# Altium PCB Skipper.PcbDoc (part 1 of 3)
Units mm, origin at the board's own origin, x right, y up, seen from the top; angles counter-clockwise.
Board outline 132 x 77.5 mm, 4 copper layers (L1, L2, L3, L4), stack 1.586 mm thick; 219 components, 173 nets, 859 pads, 487 vias.
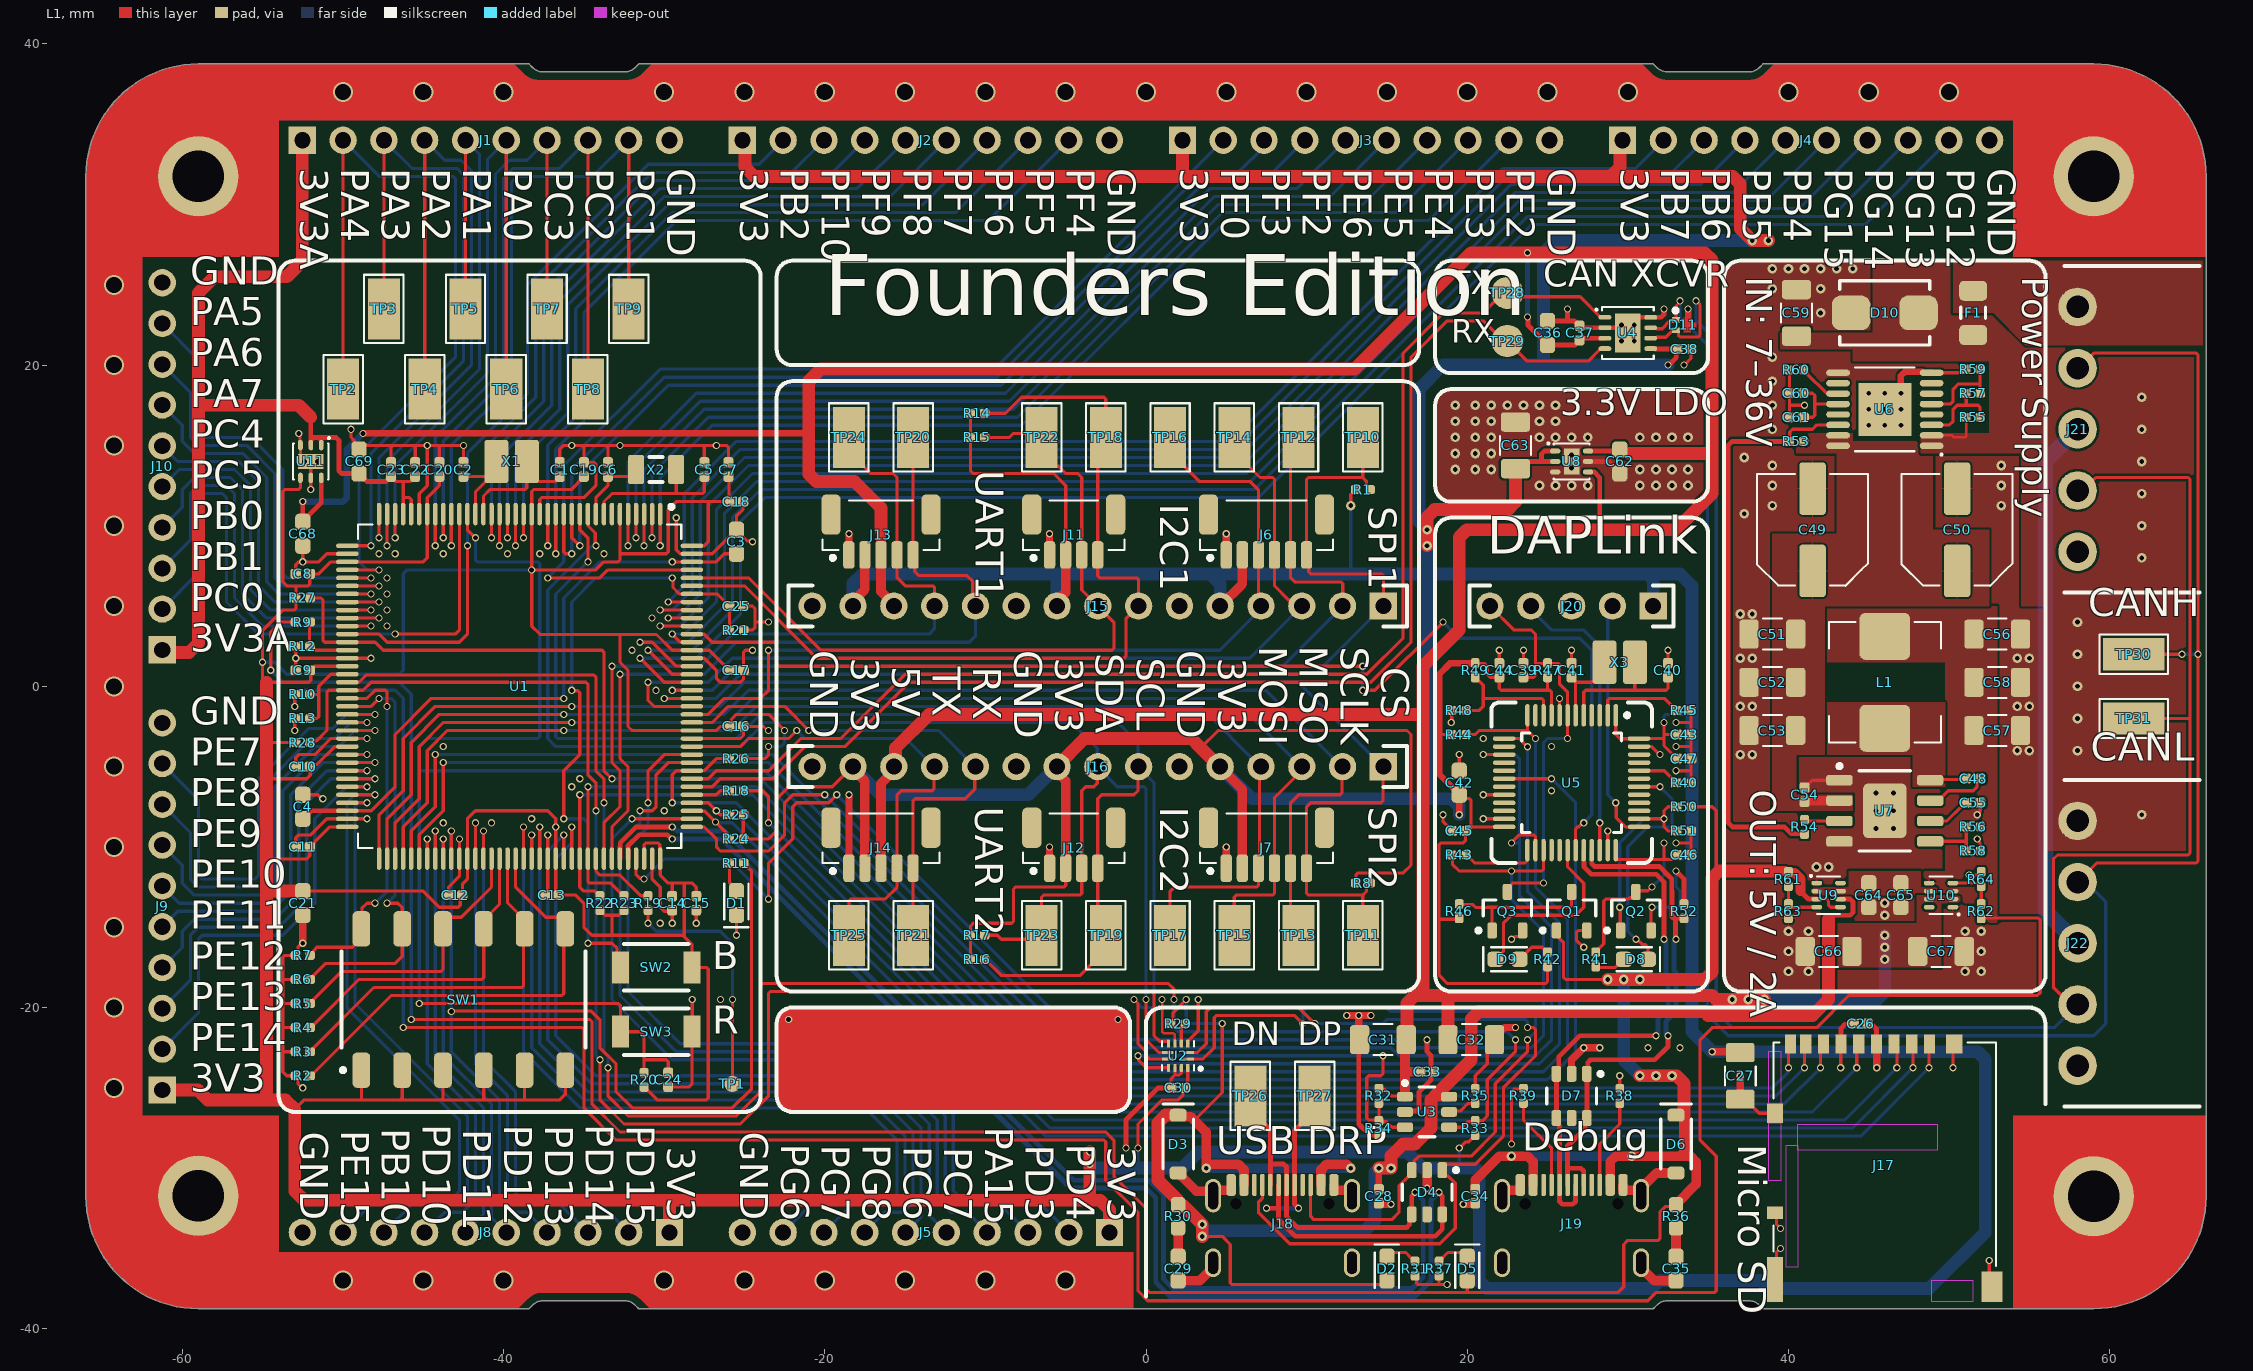
[diagram p0: L1 view]
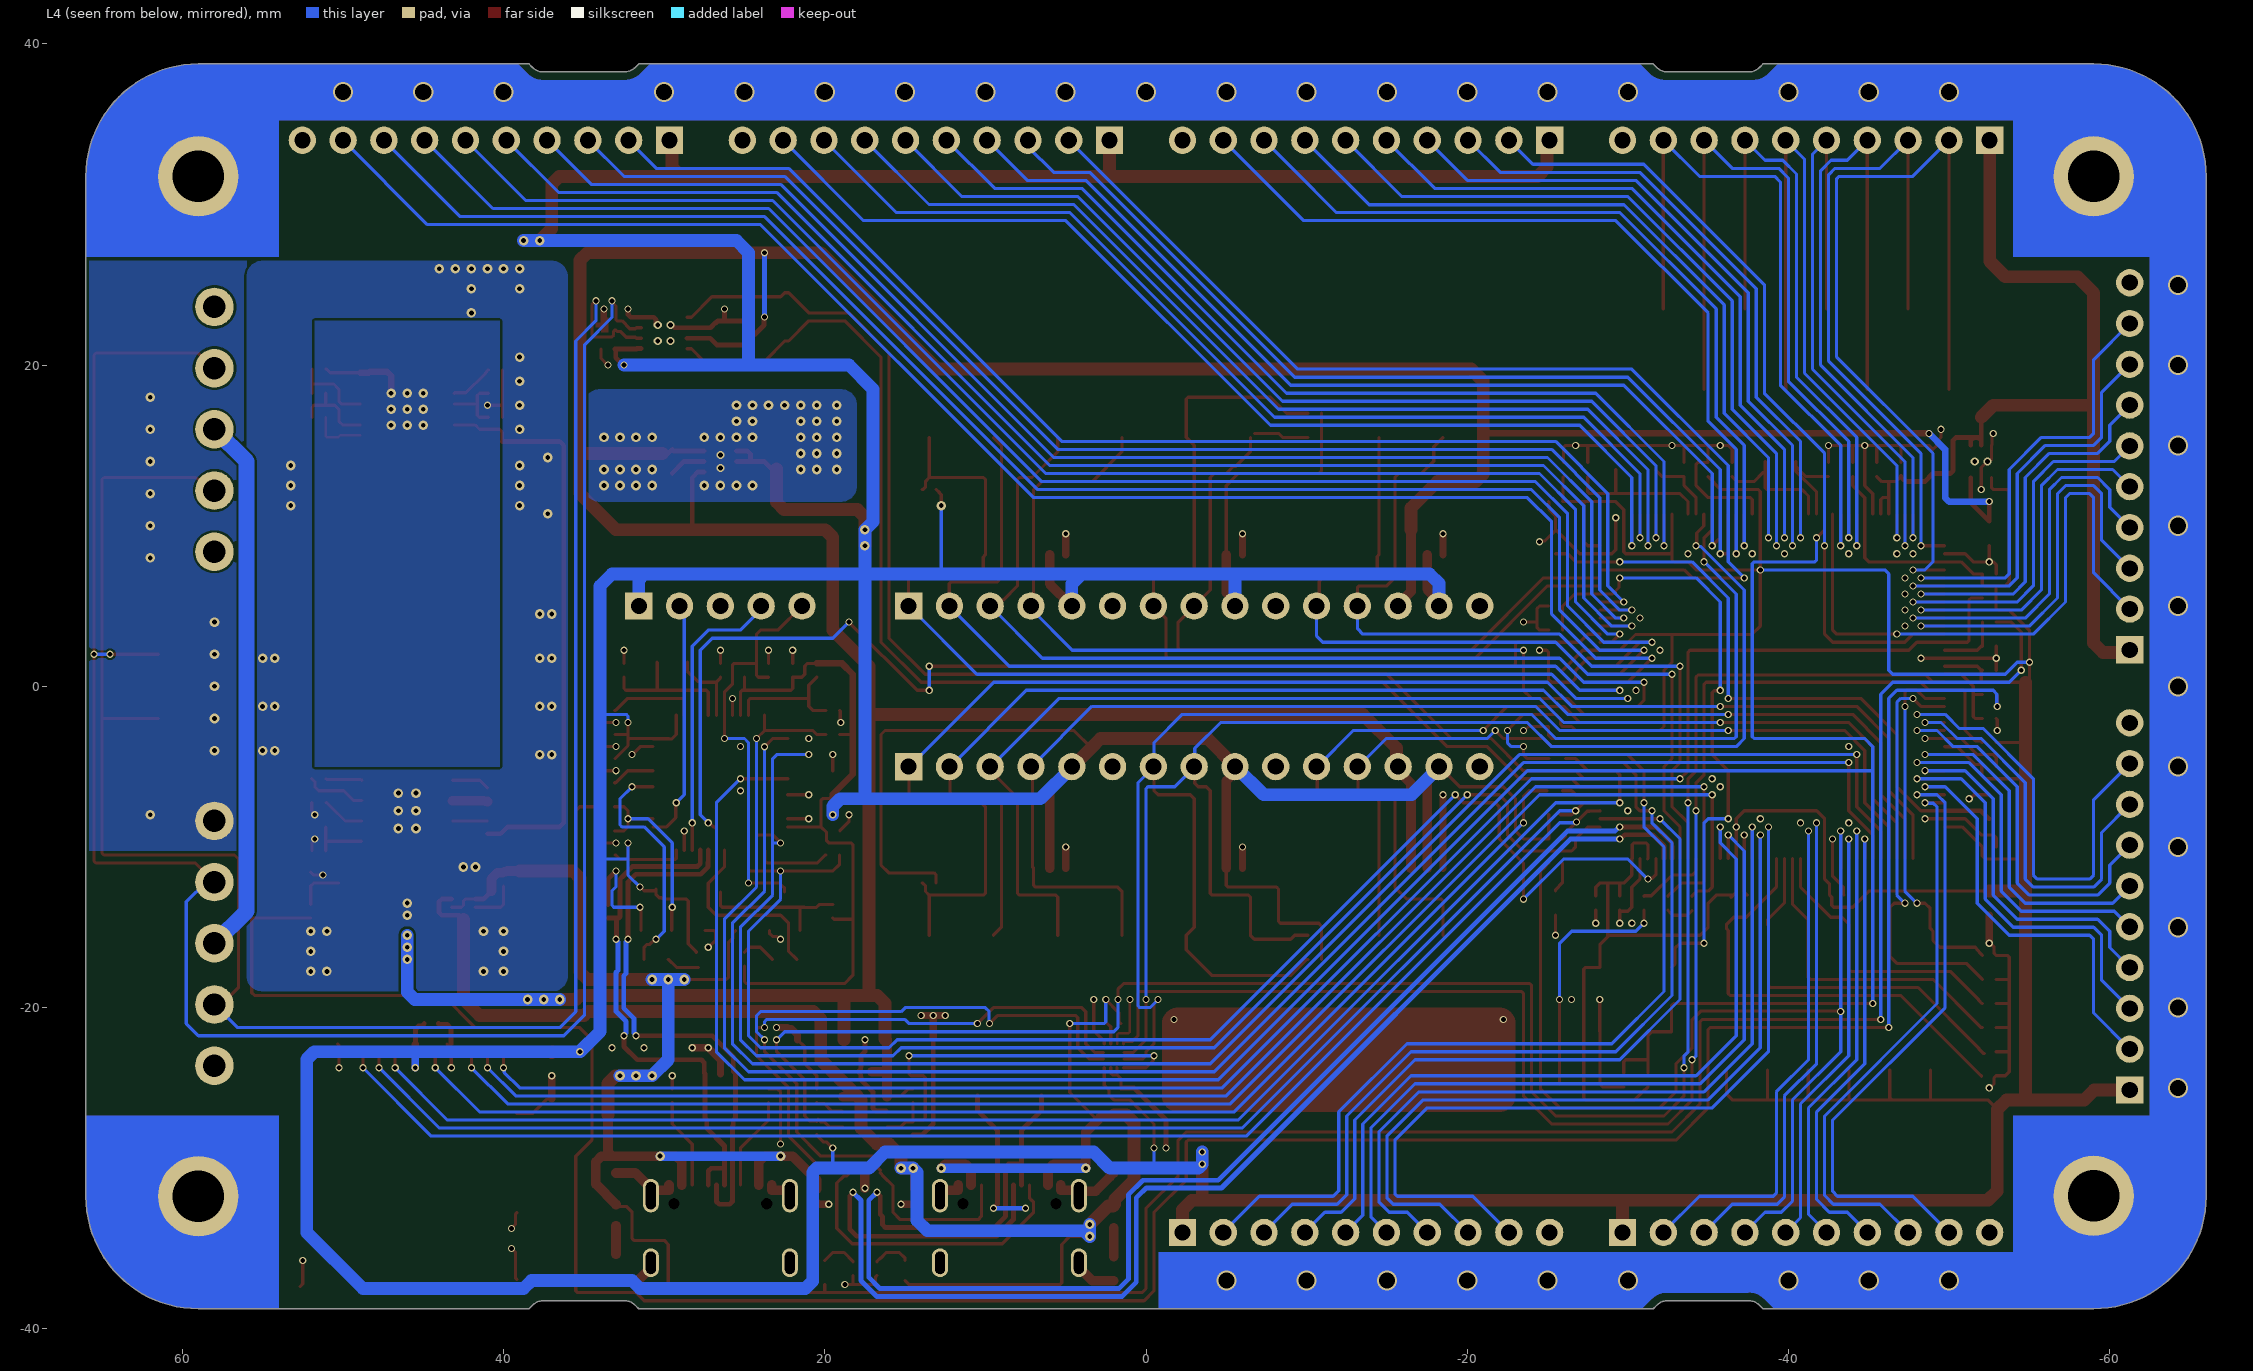
[diagram p1: L4 view, seen from below]
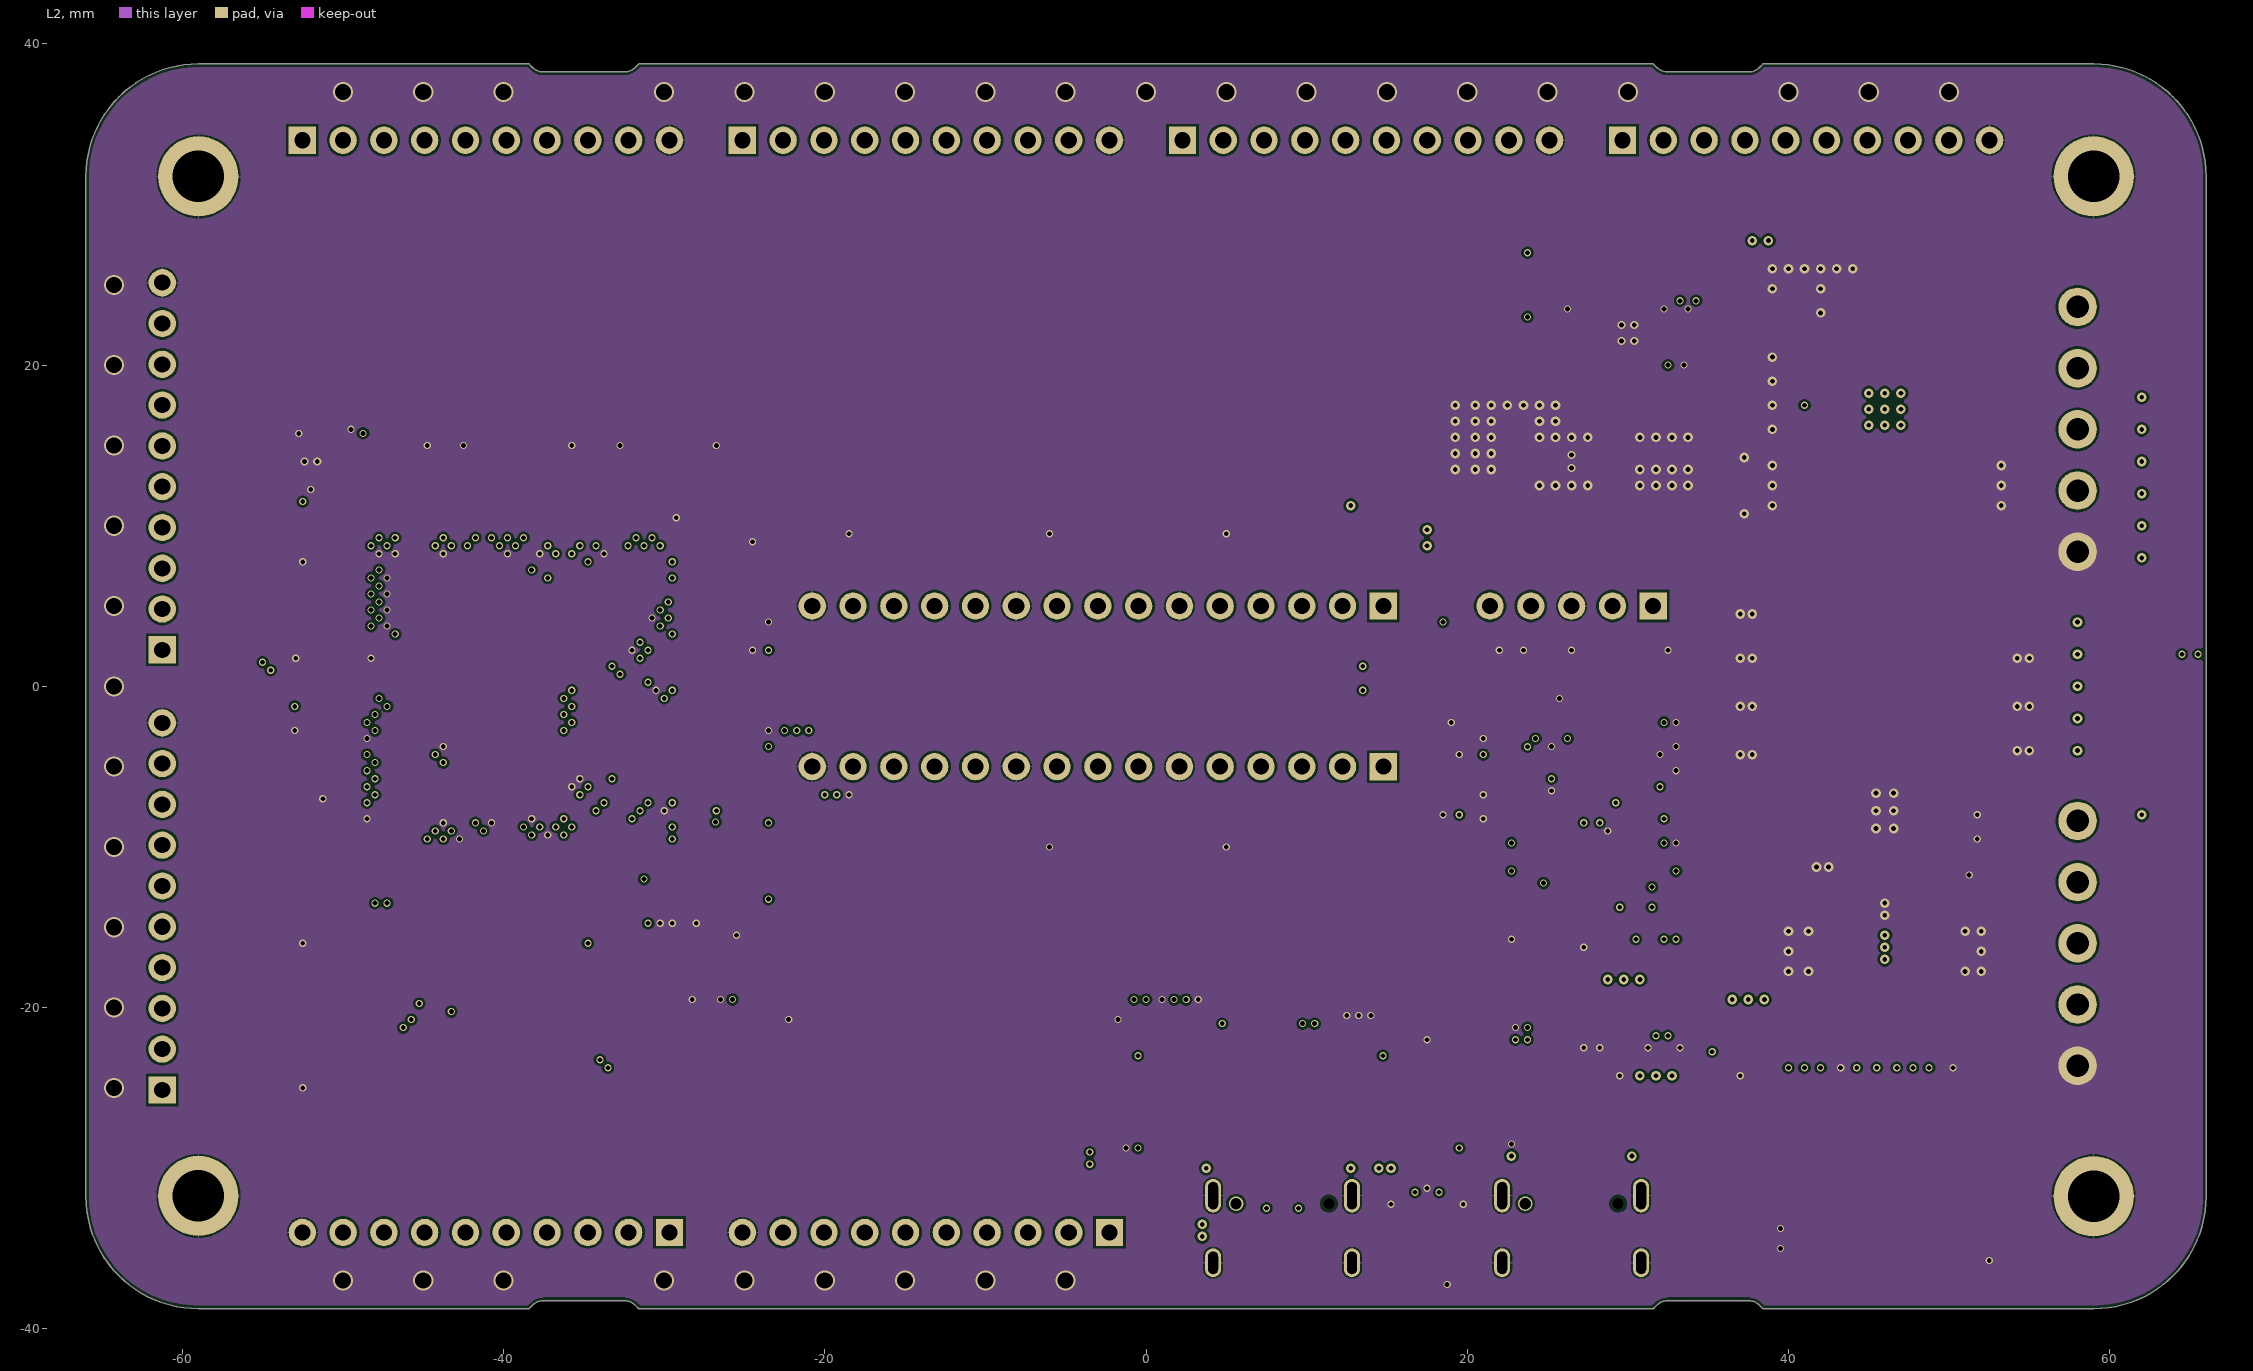
[diagram p2: L2]
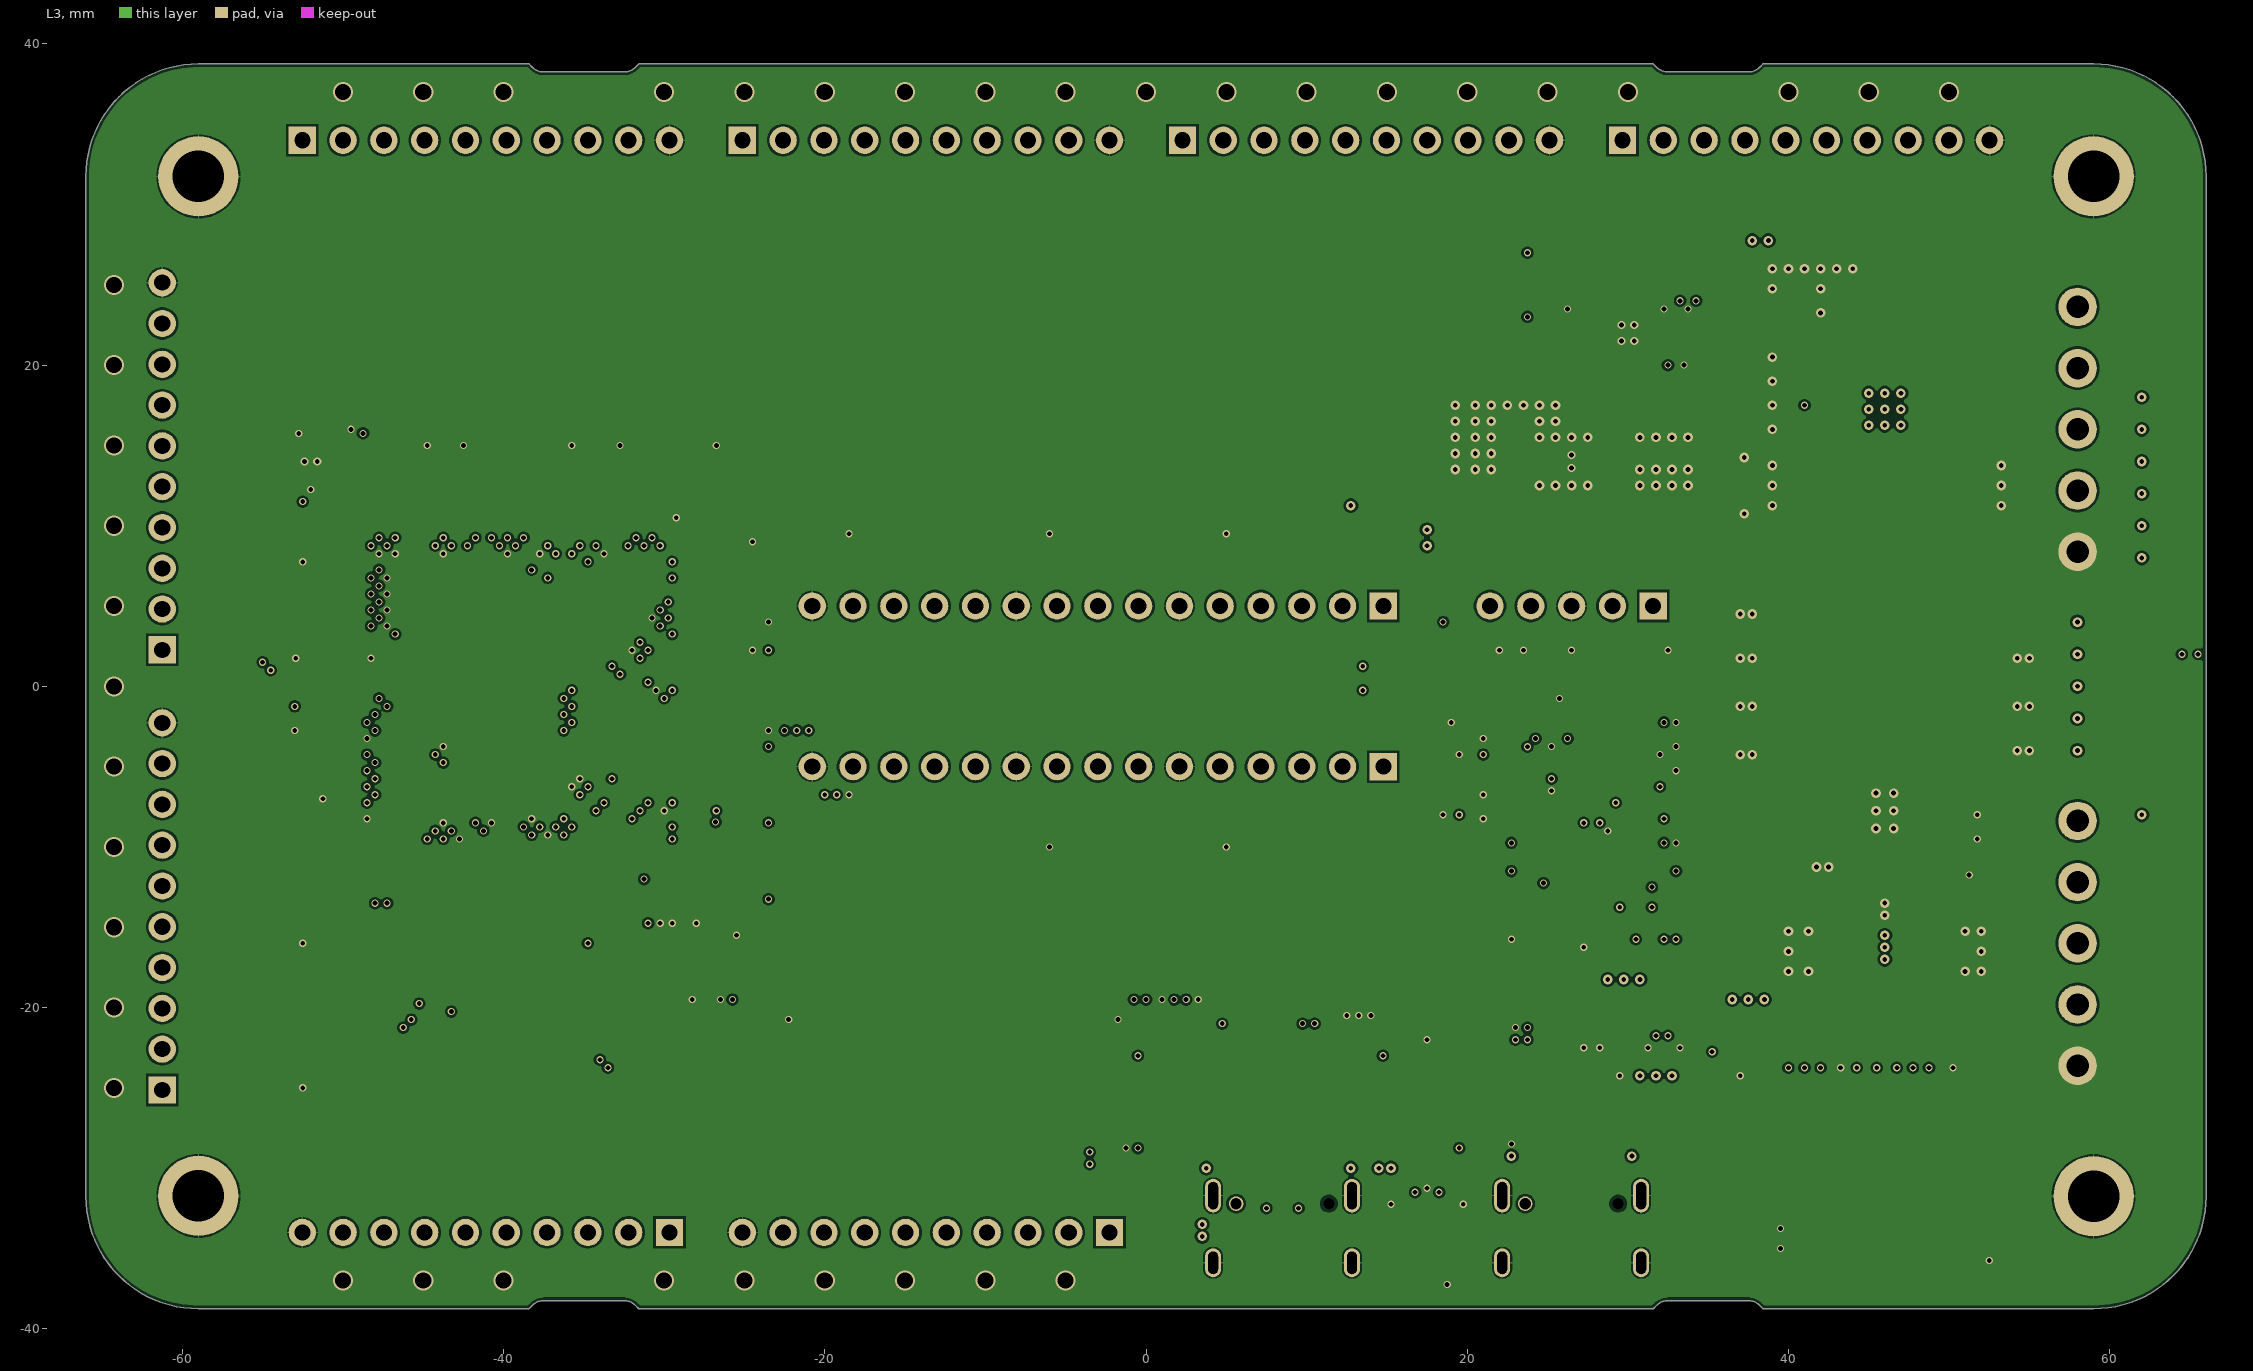
[diagram p3: L3]
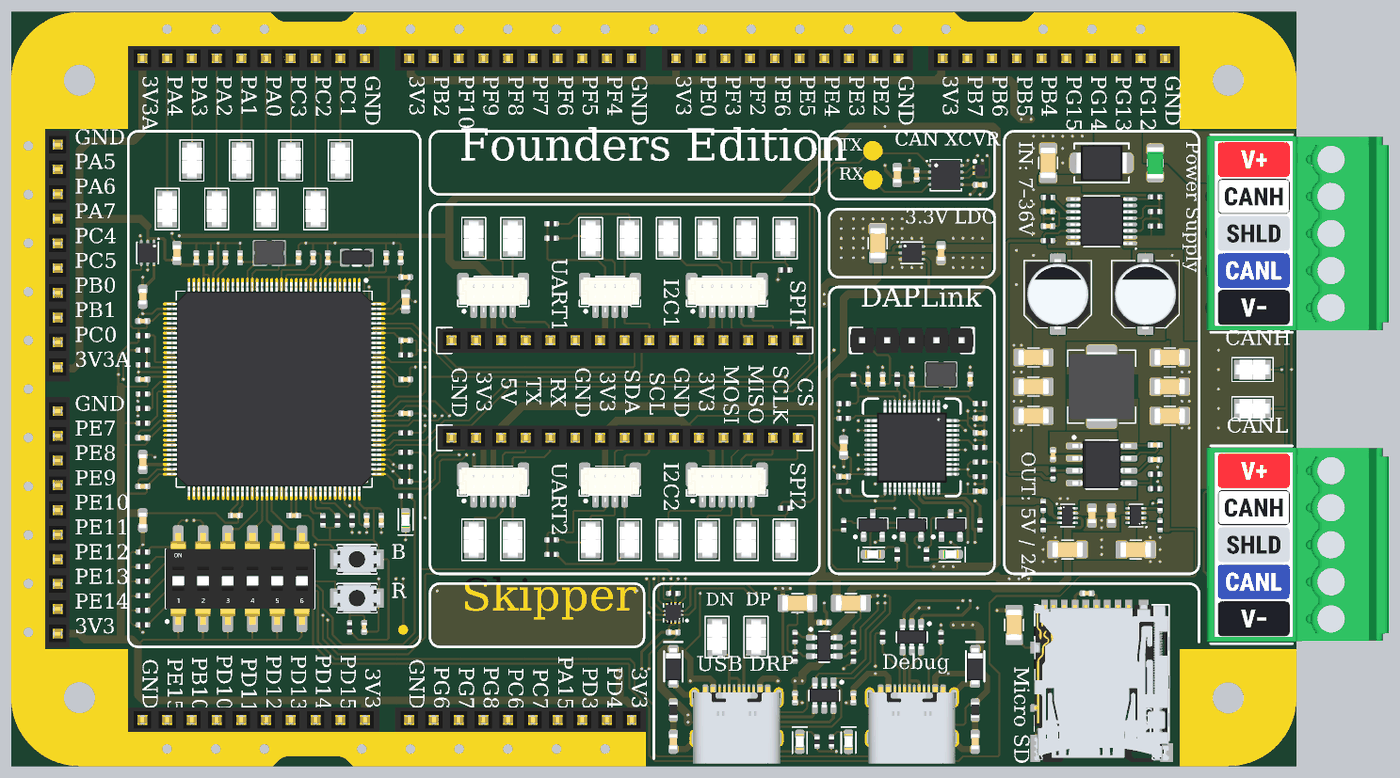
[diagram p6: 3D render of the assembled board from above, using the file's embedded part models]

## Layer stack, top to bottom
Top Solder: solder mask 0.0102, Solder Resist, Dk 3.5
L1: signal copper 0.035
Dielectric 2: prepreg 0.2104, PP-006, Dk 4.4
L2: signal copper 0.0152
Dielectric 1: core 1.065, Core-025, Dk 4.6
L3: signal copper 0.0152
Dielectric 3: prepreg 0.2104, PP-006, Dk 4.4
L4: signal copper 0.035
Bottom Solder: solder mask 0.0102, Solder Resist, Dk 3.5

## Board outline
-59,-38.75 -38.414,-38.75 -38.207,-38.543 cw(c-37.5,-39.25) -37.5,-38.25 -37.498,-38.25 -32.5,-38.25 cw(c-32.5,-39.25) -31.793,-38.543 -31.586,-38.75 31.586,-38.75 31.793,-38.543 cw(c32.5,-39.25) 32.5,-38.25 32.502,-38.25 37.5,-38.25 cw(c37.5,-39.25) 38.207,-38.543 38.414,-38.75 59,-38.75 ccw(c59,-31.75) 66,-31.75 66,31.75 ccw(c59,31.75) 59,38.75 38.414,38.75 38.207,38.543 cw(c37.5,39.25) 37.5,38.25 37.498,38.25 32.5,38.25 cw(c32.5,39.25) 31.793,38.543 31.586,38.75 -31.586,38.75 -31.793,38.543 cw(c-32.5,39.25) -32.5,38.25 -32.502,38.25 -37.5,38.25 cw(c-37.5,39.25) -38.207,38.543 -38.414,38.75 -59,38.75 ccw(c-59,31.75) -66,31.75 -66,-31.75 ccw(c-59,-31.75)

## Design rules (kind name [scope] priority, off if disabled: settings)
BoardOutlineClearance [All] p1: gap=0.2 ignorepadtopadclearanceinfootprint=FALSE
Clearance [All] p1: gap=0.15 ignorepadtopadclearanceinfootprint=TRUE except(0.2: Arc-Hole Track-Hole SMDPad-Hole THPad-Hole Via-Hole Fill-Hole Poly-Hole Region-Hole Text-Hole)
ComponentClearance [All] p1: gap=0.102 collisioncheckmode=3 verticalgap=0.102 showdistances=TRUE
DiffPairsRouting CANFD [InDifferentialPair('CANFD')] p1: maxlimit=0.347 minlimit=0.127 mostfreqgap=0.347 toplayer_mingap=0.347 toplayer_minwidth=0.2 toplayer_maxwidth=0.2 toplayer_prefwidth=0.2 midlayer1_maxgap=0.127 midlayer1_prefgap=0.127 midlayer1_minwidth=0.057 midlayer1_maxwidth=0.057 midlayer1_prefwidth=0.057 midlayer2_maxgap=0.127 midlayer2_prefgap=0.127 midlayer2_minwidth=0.057 midlayer2_maxwidth=0.057 midlayer2_prefwidth=0.057 bottomlayer_mingap=0.347 bottomlayer_minwidth=0.2 bottomlayer_maxwidth=0.2 bottomlayer_prefwidth=0.2 impedanceprofiledriven=TRUE impedanceprofileid={B1618B78-4636-4C08-B1D5-6EA13C94BCF2} impedanceprofilevalue=120.000000 maxuncoupledlength=12.7
DiffPairsRouting MCU_USB [InDifferentialPair('USB_D')] p2: maxlimit=0.186 minlimit=0.127 mostfreqgap=0.186 toplayer_mingap=0.186 toplayer_minwidth=0.3 toplayer_maxwidth=0.3 toplayer_prefwidth=0.3 midlayer1_maxgap=0.127 midlayer1_prefgap=0.127 midlayer1_minwidth=0.154 midlayer1_maxwidth=0.154 midlayer1_prefwidth=0.154 midlayer2_maxgap=0.127 midlayer2_prefgap=0.127 midlayer2_minwidth=0.154 midlayer2_maxwidth=0.154 midlayer2_prefwidth=0.154 bottomlayer_mingap=0.186 bottomlayer_minwidth=0.3 bottomlayer_maxwidth=0.3 bottomlayer_prefwidth=0.3 impedanceprofiledriven=TRUE impedanceprofileid={60AFD6B8-FE97-4B04-A706-D8CB3E3EAC41} impedanceprofilevalue=90.000000 maxuncoupledlength=12.7
DiffPairsRouting DAP_USB [InDifferentialPair('DAP_D')] p3: maxlimit=0.186 minlimit=0.127 mostfreqgap=0.186 toplayer_mingap=0.186 toplayer_minwidth=0.3 toplayer_maxwidth=0.3 toplayer_prefwidth=0.3 midlayer1_maxgap=0.127 midlayer1_prefgap=0.127 midlayer1_minwidth=0.154 midlayer1_maxwidth=0.154 midlayer1_prefwidth=0.154 midlayer2_maxgap=0.127 midlayer2_prefgap=0.127 midlayer2_minwidth=0.154 midlayer2_maxwidth=0.154 midlayer2_prefwidth=0.154 bottomlayer_mingap=0.186 bottomlayer_minwidth=0.3 bottomlayer_maxwidth=0.3 bottomlayer_prefwidth=0.3 impedanceprofiledriven=TRUE impedanceprofileid={60AFD6B8-FE97-4B04-A706-D8CB3E3EAC41} impedanceprofilevalue=90.000000 maxuncoupledlength=12.7
Height [All] p1: minheight=0 maxheight=1816.048 prefheight=12.7
HoleSize [All] p1: absolutevalues=TRUE maxlimit=6.3 minlimit=0.2 maxpercent=80.000 minpercent=20.000
HoleToHoleClearance [All] p1: gap=0.254 allowstackedmicrovias=FALSE
MinimumAnnularRing [All] p1: minimumring=0.05
MinimumSolderMaskSliver [All] p1: minsoldermaskwidth=0.172
PlaneClearance [All] p1: clearance=0.102
PlaneConnect PlaneConnectPowerPads [InPadClass('PowerPads')] p1: planeconnectstyle=Direct reliefexpansion=0.508 reliefentries=4 reliefconductorwidth=0.254 reliefairgap=0.254
PlaneConnect [All] p2: pad.planeconnectstyle=Relief pad.reliefexpansion=0.3 pad.reliefentries=4 pad.reliefconductorwidth=0.102 pad.reliefairgap=0.102 via.planeconnectstyle=Direct via.reliefexpansion=0.3 via.reliefentries=4 via.reliefconductorwidth=0.127 via.reliefairgap=0.127
PolygonConnect PolygonConnectPowerPads [All vs (InPadClass('PowerPads'))] p1: connectstyle=Direct reliefconductorwidth=0.254 reliefentries=4 polygonreliefangle="90 Angle" airgapwidth=0.254
PolygonConnect [All] p2: thpad.connectstyle=Relief thpad.reliefconductorwidth=0.102 thpad.reliefentries=4 thpad.polygonreliefangle="90 Angle" thpad.airgapwidth=0.102 smdpad.connectstyle=Relief smdpad.reliefconductorwidth=0.102 smdpad.reliefentries=4 smdpad.polygonreliefangle="90 Angle" smdpad.airgapwidth=0.102 via.connectstyle=Direct via.reliefconductorwidth=0.127 via.reliefentries=4 via.polygonreliefangle="90 Angle" via.airgapwidth=0.127
RoutingVias [All] p1: holewidth=0.2 width=0.45 viastyle="Through Hole" minholewidth=0.2 minwidth=0.45 maxholewidth=6.3 maxwidth=6.55
SilkToSilkClearance [All] p1: silktosilkclearance=0.127
SilkToSolderMaskClearance [IsPad] p1: minsilkscreentomaskgap=0.127 clearancetoexposedcopper=TRUE
SolderMaskExpansion [All] p1: expansion=0.024 istentingtop=FALSE
SupplyNets "Schematic Supply Nets_9" [InNet('3.3V')] p1: voltage=0.000
SupplyNets "Schematic Supply Nets_8" [InNet('5V_USB')] p2: voltage=0.000
SupplyNets "Schematic Supply Nets_7" [InNet('GND')] p3: voltage=0.000
SupplyNets "Schematic Supply Nets_6" [InNet('5V')] p4: voltage=0.000
SupplyNets "Schematic Supply Nets_5" [InNet('5V_BUCK')] p5: voltage=0.000
SupplyNets "Schematic Supply Nets_4" [InNet('USB_DRP_VBUS')] p6: voltage=0.000
SupplyNets "Schematic Supply Nets_2" [InNet('3.3VA')] p7: voltage=0.000
SupplyNets "Schematic Supply Nets_1" [InNet('HVIN')] p8: voltage=0.000
SupplyNets "Schematic Supply Nets" [InNet('USB_UFP_VBUS')] p9: voltage=0.000
UnRoutedNet [All] p1: checkbadconnections=TRUE
Width Width_6mil [All] p1: maxlimit=25.4 minlimit=0.152 preferedwidth=0.152 minimp=50.000000 maximp=50.000000 favimp=50.000000
Width Width_10mil [All] p2: maxlimit=25.4 minlimit=0.254 preferedwidth=0.254 minimp=50.000000 maximp=50.000000 favimp=50.000000
Width Power_20mil [All] p3: maxlimit=25.4 minlimit=0.508 preferedwidth=0.508 minimp=50.000000 maximp=50.000000 favimp=50.000000
Width Power_12mil [All] p4: maxlimit=25.4 minlimit=0.305 preferedwidth=0.305 minimp=50.000000 maximp=50.000000 favimp=50.000000
Width Width_4mil [All] p5: maxlimit=25.4 minlimit=0.102 preferedwidth=0.102 minimp=50.000000 maximp=50.000000 favimp=50.000000
19 further rules are at their usual default settings.

## Classes and differential pairs
pad class PowerPads: C51-1 C51-2 C52-1 C52-2 C53-1 C53-2 C54-1 C54-2 C56-1 C56-2 C57-1 C57-2 C58-1 C58-2 C59-1 C59-2 C62-1 C63-1 C64-1 C64-2 C65-1 C65-2 C66-1 C66-2 C67-1 C67-2 D10-1 D10-2 F1-1 F1-2 J21-1 J21-5 J22-1 J22-5 L1-1 L1-2 U6-1 U6-2 U6-9 U6-15 U6-16 U7-1 U7-2 U7-4 U7-8 U7-9 U8-3 U8-5 U8-EP U9-2 U9-7 U10-2 U10-3 U10-6 U10-7
component class USBC_UFP: C34 C35 D5 D6 D7 J19 R36 R37 R38 R39
component class USBC_DRP: C28 C29 C30 C31 C32 C33 D2 D3 D4 J18 R28 R29 R30 R31 R32 R33 R34 R35 TP26 TP27 U2 U3
component class SDMMC: C26 C27 J17 R22 R23 R24 R25 R26 R27
component class Power_Supply: C48 C49 C50 C51 C52 C53 C54 C55 C56 C57 C58 C59 C60 C61 C62 C63 C64 C65 C66 C67 C68 C69 L1 R53 R54 R55 R56 R57 R58 R59 R60 R61 R62 R63 R64 U6 U7 U8 U9 U10 U11
component class MCU_IO: D1 R1 R2 R3 R4 R5 R6 R7 R8 R9 R10 R11 R12 R13 R14 R15 R16 R17 R18 SW1 U1
component class MCU_Core: C1 C2 C3 C4 C5 C6 C7 C8 C9 C10 C11 C12 C13 C14 C15 C16 C17 C18 C19 C20 C21 C22 C23 C24 C25 R19 R20 R21 SW2 SW3 TP1 X1 X2
component class Headers: J1 J2 J3 J4 J5 J6 J7 J8 J9 J10 J11 J12 J13 J14 J15 J16 TP2 TP3 TP4 TP5 TP6 TP7 TP8 TP9 TP10 TP11 TP12 TP13 TP14 TP15 TP16 TP17 TP18 TP19 TP20 TP21 TP22 TP23 TP24 TP25
component class DAP: C39 C40 C41 C42 C43 C44 C45 C46 C47 D8 D9 J20 Q1 Q2 Q3 R40 R41 R42 R43 R44 R45 R46 R47 R48 R49 R50 R51 R52 U5 X3
component class CAN: C36 C37 C38 TP28 TP29 TP30 TP31 U4
component class Bus_Access: D10 D11 F1 J21 J22
differential pair USB_D: +USB_D_P -USB_D_N
differential pair DAP_D: +DAP_D_P -DAP_D_N

## Components (designator, comment, footprint, x,y, rotation, side; value= is the part's Value field where it differs from the comment)
C1 "CL05C100JB5NNNC" CAPACITOR-0402 -36.5,13.5 r270 top value=10pF
C2 "CL05C100JB5NNNC" CAPACITOR-0402 -42.5,13.5 r270 top value=10pF
C3 "CL10A225KO8NNNC" CAPACITOR-0603 -25.5,9 r270 top value=2.2uF
C4 "CL10A225KO8NNNC" CAPACITOR-0603 -52.5,-7.5 r270 top value=2.2uF
C5 "CL05C100JB5NNNC" CAPACITOR-0402 -27.5,13.5 r270 top value=10pF
C6 "CL05C100JB5NNNC" CAPACITOR-0402 -33.5,13.5 r270 top value=10pF
C7 "CL05B104KB54PNC" CAPACITOR-0402 -26,13.5 r270 top value=100nF
C8 "CL05B104KB54PNC" CAPACITOR-0402 -52.5,7 r0 top value=100nF
C9 "CL05B104KB54PNC" CAPACITOR-0402 -52.5,1 r0 top value=100nF
C10 "CL05B104KB54PNC" CAPACITOR-0402 -52.5,-5 r0 top value=100nF
C11 "CL05B104KB54PNC" CAPACITOR-0402 -52.5,-10 r0 top value=100nF
C12 "CL05B104KB54PNC" CAPACITOR-0402 -43,-13 r0 top value=100nF
C13 "CL05B104KB54PNC" CAPACITOR-0402 -37,-13 r0 top value=100nF
C14 "CL05B104KB54PNC" CAPACITOR-0402 -29.5,-13.5 r90 top value=100nF
C15 "CL05B104KB54PNC" CAPACITOR-0402 -28,-13.5 r90 top value=100nF
C16 "CL05B104KB54PNC" CAPACITOR-0402 -25.5,-2.5 r180 top value=100nF
C17 "CL05B104KB54PNC" CAPACITOR-0402 -25.5,1 r180 top value=100nF
C18 "CL05B104KB54PNC" CAPACITOR-0402 -25.5,11.5 r180 top value=100nF
C19 "CL05B104KB54PNC" CAPACITOR-0402 -35,13.5 r270 top value=100nF
C20 "CL05B104KB54PNC" CAPACITOR-0402 -44,13.5 r270 top value=100nF
C21 "CL10A225KO8NNNC" CAPACITOR-0603 -52.5,-13.5 r90 top value=2.2uF
C22 "CL05B104KB54PNC" CAPACITOR-0402 -45.5,13.5 r270 top value=100nF
C23 "CL05B104KB54PNC" CAPACITOR-0402 -47,13.5 r270 top value=100nF
C24 "CL05B104KB54PNC" CAPACITOR-0402 -29.75,-24.5 r90 top value=100nF
C25 "CL05B104KB54PNC" CAPACITOR-0402 -25.5,5 r180 top value=100nF
C26 "CL05B104KB54PNC" CAPACITOR-0402 44.5,-21 r0 top value=100nF
C27 "CL31A226KAHNNNE" CAPACITOR-1206 37,-24.25 r90 top value=22uF
C28 "CL05A105KA5NQNC" CAPACITOR-0402 14.5,-31.75 r90 top value=1uF
C29 "CL10A225KO8NNNC" CAPACITOR-0603 2,-36.25 r90 top value=2.2uF
C30 "CL05B104KB54PNC" CAPACITOR-0402 2,-25 r0 top value=100nF
C31 "CL31A226KAHNNNE" CAPACITOR-1206 14.75,-22 r0 top value=22uF
C32 "CL31A226KAHNNNE" CAPACITOR-1206 20.25,-22 r180 top value=22uF
C33 "CL05B104KB54PNC" CAPACITOR-0402 17.5,-24 r180 top value=100nF
C34 "CL05A105KA5NQNC" CAPACITOR-0402 20.5,-31.75 r90 top value=1uF
C35 "CL10A225KO8NNNC" CAPACITOR-0603 33,-36.25 r90 top value=2.2uF
C36 "CL10A225KO8NNNC" CAPACITOR-0603 25,22 r270 top value=2.2uF
C37 "CL05B104KB54PNC" CAPACITOR-0402 27,22 r270 top value=100nF
C38 "CL05B104KB54PNC" CAPACITOR-0402 33.5,21 r180 top value=100nF
C39 "CL05B104KB54PNC" CAPACITOR-0402 23.5,1 r90 top value=100nF
C40 "CL05C100JB5NNNC" CAPACITOR-0402 32.5,1 r270 top value=10pF
C41 "CL05C100JB5NNNC" CAPACITOR-0402 26.5,1 r270 top value=10pF
C42 "CL10A225KO8NNNC" CAPACITOR-0603 19.5,-6 r270 top value=2.2uF
C43 "CL05B104KB54PNC" CAPACITOR-0402 33.5,-3 r180 top value=100nF
C44 "CL05B104KB54PNC" CAPACITOR-0402 22,1 r270 top value=100nF
C45 "CL05B104KB54PNC" CAPACITOR-0402 19.5,-9 r0 top value=100nF
C46 "CL05B104KB54PNC" CAPACITOR-0402 33.5,-10.5 r180 top value=100nF
C47 "CL05B104KB54PNC" CAPACITOR-0402 33.5,-4.5 r180 top value=100nF
C48 "CL05B104KB54PNC" CAPACITOR-0402 51.5,-5.75 r0 top value=100nF
C49 "EMLA500ARA470MF80G" CAPACITOR_6.3X7.7 41.5,9.75 r90 top value=47uF
C50 "EMLA500ARA470MF80G" CAPACITOR_6.3X7.7 50.5,9.75 r90 top value=47uF
C51 "CC1206KKX7R0BB225" CAPACITOR-1206 39,3.25 r0 top value=2.2uF
C52 "CC1206KKX7R0BB225" CAPACITOR-1206 39,0.25 r0 top value=2.2uF
C53 "CC1206KKX7R0BB225" CAPACITOR-1206 39,-2.75 r0 top value=2.2uF
C54 "CL05B104KB54PNC" CAPACITOR-0402 41,-6.75 r270 top value=100nF
C55 "CL05A105KA5NQNC" CAPACITOR-0402 51.5,-7.25 r180 top value=1uF
C56 "CL31A226KAHNNNE" CAPACITOR-1206 53,3.25 r180 top value=22uF
C57 "CL31A226KAHNNNE" CAPACITOR-1206 53,-2.75 r180 top value=22uF
C58 "CL31A226KAHNNNE" CAPACITOR-1206 53,0.25 r180 top value=22uF
C59 "CC1206KKX7R0BB225" CAPACITOR-1206 40.5,23.25 r270 top value=2.2uF
C60 "CL05B104KB54PNC" CAPACITOR-0402 40.5,18.25 r0 top value=100nF
C61 "CL05B104KB54PNC" CAPACITOR-0402 40.5,16.75 r0 top value=100nF
C62 "CL10A225KO8NNNC" CAPACITOR-0603 29.5,14 r90 top value=2.2uF
C63 "CL31A226KAHNNNE" CAPACITOR-1206 23,15 r270 top value=22uF
C64 "CL10A225KO8NNNC" CAPACITOR-0603 45,-13 r90 top value=2.2uF
C65 "CL10A225KO8NNNC" CAPACITOR-0603 47,-13 r90 top value=2.2uF
C66 "CL31A226KAHNNNE" CAPACITOR-1206 42.5,-16.5 r0 top value=22uF
C67 "CL31A226KAHNNNE" CAPACITOR-1206 49.5,-16.5 r180 top value=22uF
C68 "CL10A225KO8NNNC" CAPACITOR-0603 -52.5,9.5 r90 top value=2.2uF
C69 "CL10A225KO8NNNC" CAPACITOR-0603 -49,14 r270 top value=2.2uF
D1 "KT-0603R" LED-0603 -25.5,-13.5 r90 top
D2 "KT-0603R" LED-0603 15,-36.25 r270 top
D3 "SMF5.0A" DIODE-SOD-123FL 2,-28.5 r90 top
D4 "TPD4E1U06DBVR-TP" SOT23-6 17.5,-31.5 r270 top
D5 "KT-0603R" LED-0603 20,-36.25 r270 top
D6 "SMF5.0A" DIODE-SOD-123FL 33,-28.5 r90 top
D7 "TPD4E1U06DBVR-TP" SOT23-6 26.5,-25.5 r270 top
D8 "KT-0603R" LED-0603 30.5,-17 r180 top
D9 "KT-0603R" LED-0603 22.5,-17 r0 top
D10 "SMBJ36CA-13-F" DIODE-SMB_DO-214AA_BIDIRECTIONAL 46,23.25 r0 top
D11 "PESD2CANFD36VQB-QZ" SOT-8015 33.5,22.5 r90 top
F1 "R12.000.8" FUSE-1206 51.5,23.25 r90 top locked value=8A
J1 "PM254-1-10-Z-8.5" CONNECTOR_FEMALE-HEADER_1X10_2.54MM_PM254-1-10-Z-8.5_NOSILK -41.1,34 r0 top
J2 "PM254-1-10-Z-8.5" CONNECTOR_FEMALE-HEADER_1X10_2.54MM_PM254-1-10-Z-8.5_NOSILK -13.7,34 r0 top
J3 "PM254-1-10-Z-8.5" CONNECTOR_FEMALE-HEADER_1X10_2.54MM_PM254-1-10-Z-8.5_NOSILK 13.7,34 r0 top
J4 "PM254-1-10-Z-8.5" CONNECTOR_FEMALE-HEADER_1X10_2.54MM_PM254-1-10-Z-8.5_NOSILK 41.1,34 r0 top
J5 "PM254-1-10-Z-8.5" CONNECTOR_FEMALE-HEADER_1X10_2.54MM_PM254-1-10-Z-8.5_NOSILK -13.7,-34 r180 top
J6 "Connector - 6pin - 1mm" CONNECTOR_HC-1.0-6PLT 7.5,10 r180 top
J7 "Connector - 6pin - 1mm" CONNECTOR_HC-1.0-6PLT 7.5,-9.5 r180 top
J8 "PM254-1-10-Z-8.5" CONNECTOR_FEMALE-HEADER_1X10_2.54MM_PM254-1-10-Z-8.5_NOSILK -41.1,-34 r180 top
J9 "PM254-1-10-Z-8.5" CONNECTOR_FEMALE-HEADER_1X10_2.54MM_PM254-1-10-Z-8.5_NOSILK -61.25,-13.7 r90 top
J10 "PM254-1-10-Z-8.5" CONNECTOR_FEMALE-HEADER_1X10_2.54MM_PM254-1-10-Z-8.5_NOSILK -61.25,13.7 r90 top
J11 "Connector - 4pin - 1mm" CONNECTOR_HC-1.0-4PLT -4.5,10 r180 top
J12 "Connector - 4pin - 1mm" CONNECTOR_HC-1.0-4PLT -4.5,-9.5 r180 top
J13 "Connector - 5pin - 1mm" CONNECTOR_HC-1.0-5PLT -16.5,10 r180 top
J14 "Connector - 5pin - 1mm" CONNECTOR_HC-1.0-5PLT -16.5,-9.5 r180 top
J15 "PM254-1-15-Z-8.5" CONNECTOR_PM254-1-15-Z-8.5 -3,5 r180 top
J16 "PM254-1-15-Z-8.5" CONNECTOR_PM254-1-15-Z-8.5 -3,-5 r180 top
J17 "DM3AT-SF-PEJM5" CONNECTOR_MICRO-SD_DM3AT-SF-PEJM5 46,-30.25 r0 top
J18 "TYPE-C-31-M-12" CONNECTOR_USBC_TYPE-C-31-M-12 8.5,-38.5 r0 top
J19 "TYPE-C-31-M-12" CONNECTOR_USBC_TYPE-C-31-M-12 26.5,-38.5 r0 top
J20 "Connector_2.54mm-1x5-unpopulated" CONNECTOR_HEADER_2.54MM_1X5 26.5,5 r180 top
J21 "WJ15EDGRC-3.81-05P-14-00A" CONNECTOR_WJ15EDGRC-3.81-05P-14-00A 58,16 r90 top
J22 "WJ15EDGRC-3.81-05P-14-00A" CONNECTOR_WJ15EDGRC-3.81-05P-14-00A 58,-16 r90 top
L1 "ASPI-0630LR-150M-T15" INDUCTOR_ASPI-0630LR 46,0.25 r90 top value=15uH
Q1 "AO3400A" SOT23-3 26.5,-14 r90 top
Q2 "MMBT3904" SOT23-3 30.5,-14 r90 top
Q3 "AO3400A" SOT23-3 22.5,-14 r90 top
R1 "0402WGF1502TCE" RESISTOR-0402 13.5,12.25 r180 top value=15k
R2 "0402WGF2003TCE" RESISTOR-0402 -52.5,-24.25 r0 top value=200k
R3 "0402WGF2003TCE" RESISTOR-0402 -52.5,-22.75 r0 top value=200k
R4 "0402WGF2003TCE" RESISTOR-0402 -52.5,-21.25 r0 top value=200k
R5 "0402WGF2003TCE" RESISTOR-0402 -52.5,-19.75 r0 top value=200k
R6 "0402WGF2003TCE" RESISTOR-0402 -52.5,-18.25 r0 top value=200k
R7 "0402WGF2003TCE" RESISTOR-0402 -52.5,-16.75 r0 top value=200k
R8 "0402WGF1502TCE" RESISTOR-0402 13.5,-12.25 r180 top value=15k
R9 "0402WGF5101TCE" RESISTOR-0402 -52.5,4 r180 top value=5.1k
R10 "0402WGF5101TCE" RESISTOR-0402 -52.5,-0.5 r180 top value=5.1k
R11 "0402WGF1501TCE" RESISTOR-0402 -25.5,-11 r0 top value=1.5k
R12 "RC0402FR-076K04L" RESISTOR-0402 -52.5,2.5 r0 top value=6.04k
R13 "RC0402FR-076K04L" RESISTOR-0402 -52.5,-2 r0 top value=6.04k
R14 "0402WGF1501TCE" RESISTOR-0402 -10.5,17 r180 top value=1.5k
R15 "0402WGF1501TCE" RESISTOR-0402 -10.5,15.5 r180 top value=1.5k
R16 "0402WGF1501TCE" RESISTOR-0402 -10.5,-17 r180 top value=1.5k
R17 "0402WGF1501TCE" RESISTOR-0402 -10.5,-15.5 r180 top value=1.5k
R18 "0402WGF330JTCE" RESISTOR-0402 -25.5,-6.5 r180 top value=33
R19 "0402WGF330JTCE" RESISTOR-0402 -31,-13.5 r90 top value=33
R20 "0402WGF2003TCE" RESISTOR-0402 -31.25,-24.5 r270 top value=200k
R21 "0402WGF1502TCE" RESISTOR-0402 -25.5,3.5 r180 top value=15k
R22 "0402WGF1502TCE" RESISTOR-0402 -34,-13.5 r270 top value=15k
R23 "0402WGF1502TCE" RESISTOR-0402 -32.5,-13.5 r270 top value=15k
R24 "0402WGF1502TCE" RESISTOR-0402 -25.5,-9.5 r0 top value=15k
R25 "0402WGF1502TCE" RESISTOR-0402 -25.5,-8 r0 top value=15k
R26 "0402WGF1502TCE" RESISTOR-0402 -25.5,-4.5 r0 top value=15k
R27 "0402WGF2003TCE" RESISTOR-0402 -52.5,5.5 r180 top value=200k
R28 "0402WGF1502TCE" RESISTOR-0402 -52.5,-3.5 r180 top value=15k
R29 "0402WGF1004TCE" RESISTOR-0402 2,-21 r180 top value=1M
R30 "0603WAF100KT5E" RESISTOR-0603 2,-33 r90 top value=1
R31 "0402WGF5101TCE" RESISTOR-0402 16.75,-36.25 r90 top value=5.1k
R32 "0402WGF1502TCE" RESISTOR-0402 14.5,-25.5 r90 top value=15k
R33 "0402WGF1502TCE" RESISTOR-0402 20.5,-27.5 r270 top value=15k
R34 "0402WGF3302TCE" RESISTOR-0402 14.5,-27.5 r90 top value=33k
R35 "0402WGF1502TCE" RESISTOR-0402 20.5,-25.5 r270 top value=15k
R36 "0603WAF100KT5E" RESISTOR-0603 33,-33 r90 top value=1
R37 "0402WGF5101TCE" RESISTOR-0402 18.25,-36.25 r90 top value=5.1k
R38 "0402WGF5101TCE" RESISTOR-0402 29.5,-25.5 r270 top value=5.1k
R39 "0402WGF5101TCE" RESISTOR-0402 23.5,-25.5 r270 top value=5.1k
R40 "0402WGF1502TCE" RESISTOR-0402 33.5,-6 r180 top value=15k
R41 "0402WGF1501TCE" RESISTOR-0402 28,-17 r90 top value=1.5k
R42 "0402WGF1501TCE" RESISTOR-0402 25,-17 r270 top value=1.5k
R43 "0402WGF1501TCE" RESISTOR-0402 19.5,-10.5 r0 top value=1.5k
R44 "0402WGF2003TCE" RESISTOR-0402 19.5,-3 r180 top value=200k
R45 "0402WGF1502TCE" RESISTOR-0402 33.5,-1.5 r180 top value=15k
R46 "0402WGF1502TCE" RESISTOR-0402 19.5,-14 r270 top value=15k
R47 "0402WGF2003TCE" RESISTOR-0402 25,1 r270 top value=200k
R48 "0402WGF1502TCE" RESISTOR-0402 19.5,-1.5 r180 top value=15k
R49 "0402WGF1502TCE" RESISTOR-0402 20.5,1 r270 top value=15k
R50 "0402WGF1502TCE" RESISTOR-0402 33.5,-7.5 r0 top value=15k
R51 "0402WGF2003TCE" RESISTOR-0402 33.5,-9 r180 top value=200k
R52 "0402WGF1501TCE" RESISTOR-0402 33.5,-14 r90 top value=1.5k
R53 "0402WGF2003TCE" RESISTOR-0402 40.5,15.25 r180 top value=200k
R54 "0402WGF2003TCE" RESISTOR-0402 41,-8.75 r270 top value=200k
R55 "0402WGF1004TCE" RESISTOR-0402 51.5,16.75 r180 top value=1M
R56 "RC0402FR-076K04L" RESISTOR-0402 51.5,-8.75 r0 top value=6.04k
R57 "0402WGF2003TCE" RESISTOR-0402 51.5,18.25 r180 top value=200k
R58 "0402WGF1501TCE" RESISTOR-0402 51.5,-10.25 r180 top value=1.5k
R59 "0402WGF3302TCE" RESISTOR-0402 51.5,19.75 r0 top value=33k
R60 "RC0402FR-076K04L" RESISTOR-0402 40.5,19.7 r0 top value=6.04k
R61 "0402WGF1502TCE" RESISTOR-0402 40,-12 r90 top value=15k
R62 "0402WGF1502TCE" RESISTOR-0402 52,-14 r270 top value=15k
R63 "0402WGF5101TCE" RESISTOR-0402 40,-14 r90 top value=5.1k
R64 "0402WGF5101TCE" RESISTOR-0402 52,-12 r270 top value=5.1k
SW1 "SMXS-06K-TP" SWITCH_SMXS-06K-TP -42.5,-19.5 r90 top
SW2 "TS-1088-AR02016" TACTILE-SWITCH_TS-1088-AR02016 -30.5,-17.5 r0 top
SW3 "TS-1088-AR02016" TACTILE-SWITCH_TS-1088-AR02016 -30.5,-21.5 r0 top
TP1 "Test Point 1mm" TESTPOINT_1MM -25.75,-24.75 r180 top
TP2 "RH-5019" TESTPOINT_RH-5019 -49.99,18.5 r0 top
TP3 "RH-5019" TESTPOINT_RH-5019 -47.45,23.5 r0 top
TP4 "RH-5019" TESTPOINT_RH-5019 -44.91,18.5 r0 top
TP5 "RH-5019" TESTPOINT_RH-5019 -42.37,23.5 r0 top
TP6 "RH-5019" TESTPOINT_RH-5019 -39.83,18.5 r0 top
TP7 "RH-5019" TESTPOINT_RH-5019 -37.29,23.5 r0 top
TP8 "RH-5019" TESTPOINT_RH-5019 -34.75,18.5 r0 top
TP9 "RH-5019" TESTPOINT_RH-5019 -32.21,23.5 r0 top
TP10 "RH-5019" TESTPOINT_RH-5019 13.5,15.5 r0 top
TP11 "RH-5019" TESTPOINT_RH-5019 13.5,-15.5 r0 top
TP12 "RH-5019" TESTPOINT_RH-5019 9.5,15.5 r0 top
TP13 "RH-5019" TESTPOINT_RH-5019 9.5,-15.5 r0 top
TP14 "RH-5019" TESTPOINT_RH-5019 5.5,15.5 r0 top
TP15 "RH-5019" TESTPOINT_RH-5019 5.5,-15.5 r0 top
TP16 "RH-5019" TESTPOINT_RH-5019 1.5,15.5 r0 top
TP17 "RH-5019" TESTPOINT_RH-5019 1.5,-15.5 r0 top
TP18 "RH-5019" TESTPOINT_RH-5019 -2.5,15.5 r0 top
TP19 "RH-5019" TESTPOINT_RH-5019 -2.5,-15.5 r0 top
TP20 "RH-5019" TESTPOINT_RH-5019 -14.5,15.5 r0 top
TP21 "RH-5019" TESTPOINT_RH-5019 -14.5,-15.5 r0 top
TP22 "RH-5019" TESTPOINT_RH-5019 -6.5,15.5 r0 top
TP23 "RH-5019" TESTPOINT_RH-5019 -6.5,-15.5 r0 top
TP24 "RH-5019" TESTPOINT_RH-5019 -18.5,15.5 r0 top
TP25 "RH-5019" TESTPOINT_RH-5019 -18.5,-15.5 r0 top
TP26 "RH-5019" TESTPOINT_RH-5019 6.5,-25.5 r180 top
TP27 "RH-5019" TESTPOINT_RH-5019 10.5,-25.5 r180 top
TP28 "Test Point 2mm" TESTPOINT_2MM 22.5,24.5 r90 top
TP29 "Test Point 2mm" TESTPOINT_2MM 22.5,21.5 r90 top
TP30 "RH-5019" TESTPOINT_RH-5019 61.5,2 r90 top
TP31 "RH-5019" TESTPOINT_RH-5019 61.5,-2 r90 top
U1 "MCU_STM32H523ZETx" LQFP-144-22X22 -39,0 r270 top locked
U2 "TUSB320" RWB0012A 2,-23 r180 top
U3 "AP22652" SOT23-6 17.5,-26.5 r0 top
U4 "TCAN1044VDRBRQ1" SON-8-3X3 30,22 r0 top
U5 "STM32F103CBT6" LQFP-48-7X7 26.5,-6 r270 top
U6 "TPS26600PWPR" TSSOP-16-EP-4.4 46,17.25 r180 top
U7 "LMR36520ADDAR" SOIC-8-EP-3.9 46,-7.75 r0 top
U8 "TLV76733DRVR" WSON-6-2X2 26.5,14 r0 top
U9 "TPS2116" SOT-5X3-8 42.5,-13 r0 top
U10 "TPS2116" SOT-5X3-8 49.5,-13 r180 top
U11 "TLV76733DRVR" WSON-6-2X2 -52,14 r270 top
X1 "NX3225GD-8MHZ-STD-CRA-3" CRYSTAL_3225-2P -39.5,14 r180 top value=8MHz
X2 "FC-135 32.7680KA-AG3" CRYSTAL_3215-2P -30.5,13.5 r180 top value=32.768kHz
X3 "NX3225GD-8MHZ-STD-CRA-3" CRYSTAL_3225-2P 29.5,1.5 r180 top value=8MHz

## Footprints (in the part's own frame and the unit in brackets; to place one, negate y for a bottom-side part, rotate by r counter-clockwise, add the part's x,y. Pads: shape width x height; smd on the part's side, far side on the other; paste and mask are expansions set on the pad)
CAPACITOR-0402 [mm] "Chip Capacitor, 2-Leads, Body 1.00x0.50mm, IPC Medium Density"
  rrect50% 0.66x0.62 smd: 1(-0.44,0) 2(0.44,0)
  body extent -0.5,-0.25 0.5,0.25, height 0.5
CAPACITOR-0603 [mm] "Chip Capacitor, 2-Leads, Body 1.60x0.80mm, IPC Medium Density"
  rrect50% 1x0.95 smd: 1(-0.75,0) 2(0.75,0)
  body extent -0.8,-0.4 0.8,0.4, height 0.8
CAPACITOR-1206 [mm] "Chip Capacitor, 2-Leads, Body 3.20x1.60mm, IPC Medium Density"
  rrect30% 1.2x1.8 smd: 1(-1.45,0) 2(1.45,0)
  silkscreen extent -0.59,-0.96 0.59,0.96, body extent -1.6,-0.8 1.6,0.8, height 1.62
CAPACITOR_6.3X7.7 [mm] "Aluminum Electrolytic Capacitor, Body 6.60x6.60x8.00mm, IPC Medium Density"
  rrect25% 3.275x1.65 smd: A(-2.562,0) K(2.563,0)
  silkscreen extent -3.49,-3.46 3.46,3.46, body extent -3.6,-3.3 3.6,3.3, height 7.7
CONNECTOR_FEMALE-HEADER_1X10_2.54MM_PM254-1-10-Z-8.5_NOSILK [mm]
  rect 1.7x1.7 hole 1: 1(-11.43,0)
  round 1.7 hole 1: 2(-8.89,0) 3(-6.35,0) 4(-3.81,0) 5(-1.27,0) 6(1.27,0) 7(3.81,0) 8(6.35,0) 9(8.89,0) 10(11.43,0)
  body extent -12.9,-1.25 12.9,1.25, height 8.5
CONNECTOR_HC-1.0-4PLT [mm]
  rrect50% 0.7x1.71 smd: 1(1.5,1.82) 2(0.5,1.82) 3(-0.5,1.82) 4(-1.5,1.82)
  rrect50% 1.2x2.5 smd: NC(-2.61,-0.695) NC(2.61,-0.695)
  silkscreen extent -3.15,-1.58 3.15,2.12, body extent -3,-1.45 3,2.15, height 4.35
CONNECTOR_HC-1.0-5PLT [mm]
  rrect50% 0.7x1.71 smd: 1(2,1.82) 2(1,1.82) 3(0,1.82) 4(-1,1.82) 5(-2,1.82)
  rrect50% 1.2x2.5 smd: NC(-3.11,-0.695) NC(3.11,-0.695)
  silkscreen extent -3.65,-1.58 3.65,2.12, body extent -3.5,-1.45 3.5,2.15, height 4.35
CONNECTOR_HC-1.0-6PLT [mm]
  rrect50% 0.7x1.71 smd: 1(2.5,1.82) 2(1.5,1.82) 3(0.5,1.82) 4(-0.5,1.82) 5(-1.5,1.82) 6(-2.5,1.82)
  rrect50% 1.2x2.5 smd: NC(-3.61,-0.695) NC(3.61,-0.695)
  silkscreen extent -4.15,-1.58 4.15,2.12, body extent -4,-1.45 4,2.15, height 4.35
CONNECTOR_HEADER_2.54MM_1X5 [mm]
  rect 1.7x1.7 hole 1: 1(-5.08,0)
  round 1.7 hole 1: 2(-2.54,0) 3(0,0) 4(2.54,0) 5(5.08,0)
  silkscreen extent -6.35,-1.27 6.35,1.27, body extent -6.35,-1.27 6.35,1.27, height 7.92
CONNECTOR_MICRO-SD_DM3AT-SF-PEJM5 [mm]
  rect 0.7x1.2 smd paste+0: 1(2.775,7.975) 2(1.675,7.975) 3(0.575,7.975) 4(-0.525,7.975) 5(-1.625,7.975) 6(-2.725,7.975) 7(-3.825,7.975) 8(-4.925,7.975) SWB(-5.875,7.975)
  rect 1x1.2 smd paste+0: MP1(-6.825,3.675) MP4(4.325,7.975)
  rect 1x2.8 smd paste+0: MP2(-6.825,-6.675)
  rect 1.3x1.9 smd paste+0: MP3(6.675,-7.125)
  rect 1x0.8 smd paste+0: SWA(-6.825,-2.525)
  L1 keep-out region: -6.475,4.275 -7.225,4.275 -7.225,7.525 -6.475,7.525
  L1 keep-out region: 5.475,-8.075 2.925,-8.075 2.925,-6.725 5.475,-6.725
  L1 keep-out region: -6.475,-0.525 -7.225,-0.525 -7.225,3.075 -6.475,3.075
  L1 keep-out region: -5.425,-5.925 -6.125,-5.925 -6.125,1.675 -5.425,1.675
  L1 keep-out region: 3.275,1.375 -5.425,1.375 -5.425,2.975 3.275,2.975
  silkscreen extent -6.93,-5.85 6.93,8.08, body extent -6.98,-8.08 6.97,8.08, height 1.69
CONNECTOR_PM254-1-15-Z-8.5 [mm]
  rect 1.7x1.7 hole 1: 1(-17.78,0)
  round 1.7 hole 1: 2(-15.24,0) 3(-12.7,0) 4(-10.16,0) 5(-7.62,0) 6(-5.08,0) 7(-2.54,0) 8(0,0) 9(2.54,0) 10(5.08,0) 11(7.62,0) 12(10.16,0) 13(12.7,0) 14(15.24,0) 15(17.78,0)
  silkscreen extent -19.25,-1.27 19.25,1.27, body extent -19.25,-1.25 19.25,1.25, height 8.5
CONNECTOR_USBC_TYPE-C-31-M-12 [mm]
  rrect50% 0.58x1.35 smd: A1/B12(-3.2,7.455) A4/B9(-2.4,7.455) B1/A12(3.2,7.455) B4/A9(2.4,7.455)
  rrect50% 0.28x1.35 smd: A5(-1.25,7.455) A6(-0.25,7.455) A7(0.25,7.455) A8(1.25,7.455) B5(1.75,7.455) B6(0.75,7.455) B7(-0.75,7.455) B8(-1.75,7.455)
  oval 1x2.1 hole 0.62 slot 1.7 at 90 deg paste+0.1: SHELL1(-4.325,6.79) SHELL3(4.325,6.79)
  oval 1x1.8 hole 0.62 slot 1.4 at 90 deg paste+0.1: SHELL2(-4.325,2.61) SHELL4(4.325,2.61)
  round 0 / inner round 0.9 / far side round 0 hole 0.7 unplated mask+0.05: ""(-2.89,6.29)
  round 0 hole 0.7 unplated mask+0.05: ""(2.89,6.29)
  body extent -4.47,0 4.47,7.91, height 3.31
CONNECTOR_WJ15EDGRC-3.81-05P-14-00A [mm]
  round 2.4 hole 1.4: 1(-7.62,0) 2(-3.81,0) 3(0,0) 4(3.81,0) 5(7.62,0)
  silkscreen extent -10.16,-7.6 10.16,0.8, body extent -9.96,-17.47 9.97,1.22, height 7.51
CRYSTAL_3215-2P [mm]
  rrect25% 1x1.8 smd: 1(-1.25,0) 2(1.25,0)
  silkscreen extent -0.4,-0.77 0.4,0.77, body extent -1.6,-0.75 1.6,0.75, height 0.92
CRYSTAL_3225-2P [mm]
  rrect25% 1.5x2.7 smd: 1(-0.95,0) 2(0.95,0)
  body extent -1.6,-1.25 1.6,1.25, height 0.82
DIODE-SMB_DO-214AA_BIDIRECTIONAL [mm] "Molded Diode, 2-Leads, Body 5.35x3.63mm, IPC Medium Density"
  rrect50% 2.4x2.15 smd: 1(-2.1,0) 2(2.1,0)
  silkscreen extent -2.8,-2 2.8,2, body extent -2.68,-1.81 2.68,1.81, height 2.65
DIODE-SOD-123FL [mm] "SODFL, 2-Leads, Body 1.65x3.63mm, IPC Medium Density"
  rrect50% 0.8x1.05 smd: A(-1.8,0) K(1.8,0)
  silkscreen extent -1.55,-0.95 2.5,0.95, body extent -1.85,-0.82 1.85,0.82, height 1.2
FUSE-1206 [mm] "Chip Fuse, 2-Leads, Body 3.10x1.60mm, IPC Medium Density"
  rrect50% 1.25x1.75 smd: 1(-1.375,0) 2(1.375,0)
  silkscreen extent -0.35,-0.77 0.35,0.77, body extent -1.6,-0.8 1.6,0.8, height 0.61
INDUCTOR_ASPI-0630LR [mm] "Precision Wire Wound Inductor, 2-Leads, Body 7.10x6.60mm, IPC Medium Density"
  rrect25% 2.925x3.15 smd: 1(-2.863,0) 2(2.862,0)
  silkscreen extent -3.75,-3.49 3.75,3.49, body extent -3.6,-3.32 3.6,3.32, height 3
LED-0603 [mm] "Chip Diode 2-Leads, Body 1.60x0.80mm, IPC Medium Density"
  rrect50% 1x0.95 smd: A(0.75,0) K(-0.75,0)
  silkscreen extent -1.5,-0.75 1.2,0.75, body extent -0.8,-0.4 0.8,0.4, height 0.35
LQFP-48-7X7 [mm] "TSQFP, 48-Leads, Body 7.00x7.00mm, Pitch 0.50mm, IPC Medium Density"
  oval 1.4x0.28 smd: 1(-4.2,2.75) 2(-4.2,2.25) 3(-4.2,1.75) 4(-4.2,1.25) 5(-4.2,0.75) 6(-4.2,0.25) 7(-4.2,-0.25) 8(-4.2,-0.75) 9(-4.2,-1.25) 10(-4.2,-1.75) 11(-4.2,-2.25) 12(-4.2,-2.75) 25(4.2,-2.75) 26(4.2,-2.25) 27(4.2,-1.75) 28(4.2,-1.25) 29(4.2,-0.75) 30(4.2,-0.25) 31(4.2,0.25) 32(4.2,0.75) 33(4.2,1.25) 34(4.2,1.75) 35(4.2,2.25) 36(4.2,2.75)
  oval 0.28x1.4 smd: 13(-2.75,-4.2) 14(-2.25,-4.2) 15(-1.75,-4.2) 16(-1.25,-4.2) 17(-0.75,-4.2) 18(-0.25,-4.2) 19(0.25,-4.2) 20(0.75,-4.2) 21(1.25,-4.2) 22(1.75,-4.2) 23(2.25,-4.2) 24(2.75,-4.2) 37(2.75,4.2) 38(2.25,4.2) 39(1.75,4.2) 40(1.25,4.2) 41(0.75,4.2) 42(0.25,4.2) 43(-0.25,4.2) 44(-0.75,4.2) 45(-1.25,4.2) 46(-1.75,4.2) 47(-2.25,4.2) 48(-2.75,4.2)
  silkscreen extent -4.32,-3.1 3.1,3.57, body extent -4.6,-4.6 4.6,4.6, height 1.6
LQFP-144-22X22 [mm] "TSQFP, 144-Leads, Body 20.00x20.00mm, Pitch 0.50mm, IPC Medium Density"
  oval 1.4x0.28 smd paste-2539.97: 1(-10.725,8.75) 2(-10.725,8.25) 3(-10.725,7.75) 4(-10.725,7.25) 5(-10.725,6.75) 6(-10.725,6.25) 7(-10.725,5.75) 8(-10.725,5.25) 9(-10.725,4.75) 10(-10.725,4.25) 11(-10.725,3.75) 12(-10.725,3.25) 13(-10.725,2.75) 14(-10.725,2.25) 15(-10.725,1.75) 16(-10.725,1.25) 17(-10.725,0.75) 18(-10.725,0.25) 19(-10.725,-0.25) 20(-10.725,-0.75) 21(-10.725,-1.25) 22(-10.725,-1.75) 23(-10.725,-2.25) 24(-10.725,-2.75) 25(-10.725,-3.25) 26(-10.725,-3.75) 27(-10.725,-4.25) 28(-10.725,-4.75) 29(-10.725,-5.25) 30(-10.725,-5.75) 31(-10.725,-6.25) 32(-10.725,-6.75) 33(-10.725,-7.25) 34(-10.725,-7.75) 35(-10.725,-8.25) 36(-10.725,-8.75) 73(10.725,-8.75) 74(10.725,-8.25) 75(10.725,-7.75) 76(10.725,-7.25) 77(10.725,-6.75) 78(10.725,-6.25) 79(10.725,-5.75) 80(10.725,-5.25) 81(10.725,-4.75) 82(10.725,-4.25) 83(10.725,-3.75) 84(10.725,-3.25) 85(10.725,-2.75) 86(10.725,-2.25) 87(10.725,-1.75) 88(10.725,-1.25) 89(10.725,-0.75) 90(10.725,-0.25) 91(10.725,0.25) 92(10.725,0.75) 93(10.725,1.25) 94(10.725,1.75) 95(10.725,2.25) 96(10.725,2.75) 97(10.725,3.25) 98(10.725,3.75) 99(10.725,4.25) 100(10.725,4.75) 101(10.725,5.25) 102(10.725,5.75) 103(10.725,6.25) 104(10.725,6.75) 105(10.725,7.25) 106(10.725,7.75) 107(10.725,8.25) 108(10.725,8.75)
  oval 0.28x1.4 smd paste-2539.97: 37(-8.75,-10.725) 38(-8.25,-10.725) 39(-7.75,-10.725) 40(-7.25,-10.725) 41(-6.75,-10.725) 42(-6.25,-10.725) 43(-5.75,-10.725) 44(-5.25,-10.725) 45(-4.75,-10.725) 46(-4.25,-10.725) 47(-3.75,-10.725) 48(-3.25,-10.725) 49(-2.75,-10.725) 50(-2.25,-10.725) 51(-1.75,-10.725) 52(-1.25,-10.725) 53(-0.75,-10.725) 54(-0.25,-10.725) 55(0.25,-10.725) 56(0.75,-10.725) 57(1.25,-10.725) 58(1.75,-10.725) 59(2.25,-10.725) 60(2.75,-10.725) 61(3.25,-10.725) 62(3.75,-10.725) 63(4.25,-10.725) 64(4.75,-10.725) 65(5.25,-10.725) 66(5.75,-10.725) 67(6.25,-10.725) 68(6.75,-10.725) 69(7.25,-10.725) 70(7.75,-10.725) 71(8.25,-10.725) 72(8.75,-10.725) 109(8.75,10.725) 110(8.25,10.725) 111(7.75,10.725) 112(7.25,10.725) 113(6.75,10.725) 114(6.25,10.725) 115(5.75,10.725) 116(5.25,10.725) 117(4.75,10.725) 118(4.25,10.725) 119(3.75,10.725) 120(3.25,10.725) 121(2.75,10.725) 122(2.25,10.725) 123(1.75,10.725) 124(1.25,10.725) 125(0.75,10.725) 126(0.25,10.725) 127(-0.25,10.725) 128(-0.75,10.725) 129(-1.25,10.725) 130(-1.75,10.725) 131(-2.25,10.725) 132(-2.75,10.725) 133(-3.25,10.725) 134(-3.75,10.725) 135(-4.25,10.725) 136(-4.75,10.725) 137(-5.25,10.725) 138(-5.75,10.725) 139(-6.25,10.725) 140(-6.75,10.725) 141(-7.25,10.725) 142(-7.75,10.725) 143(-8.25,10.725) 144(-8.75,10.725)
  silkscreen extent -11.3,-10.06 10.06,10.06, body extent -11,-11 11,11, height 1.63
RESISTOR-0402 [mm] "Chip Resistor, 2-Leads, Body 1.00x0.50mm, IPC Medium Density"
  rrect50% 0.6x0.55 smd: 1(-0.45,0) 2(0.45,0)
  body extent -0.5,-0.25 0.5,0.25, height 0.35
RESISTOR-0603 [mm] "Chip Resistor, 2-Leads, Body 1.60x0.80mm, IPC Medium Density"
  rrect50% 0.95x0.9 smd: 1(-0.725,0) 2(0.725,0)
  body extent -0.8,-0.4 0.8,0.4, height 0.45
RWB0012A [mm]
  rrect50% 0.7x0.2 smd mask-2539.97: 1(-0.65,0.2) 2(-0.65,-0.2) 7(0.65,-0.2) 8(0.65,0.2)
  rrect50% 0.2x0.5 smd mask-2539.97: 3(-0.6,-0.75) 4(-0.2,-0.75) 5(0.2,-0.75) 6(0.6,-0.75) 9(0.6,0.75) 10(0.2,0.75) 11(-0.2,0.75) 12(-0.6,0.75)
  silkscreen extent -1.5,-0.92 1,0.92, body extent -0.8,-0.8 0.8,0.8, height 0.4
SOIC-8-EP-3.9 [mm] "SOIC, 8-Leads, Body 4.90x3.90mm, Pitch 1.27mm, Thermal Pad 3.40x2.71mm, IPC Low Density"
  rrect50% 1.65x0.65 smd: 1(-2.825,1.905) 2(-2.825,0.635) 3(-2.825,-0.635) 4(-2.825,-1.905) 5(2.825,-1.905) 6(2.825,-0.635) 7(2.825,0.635) 8(2.825,1.905)
  rrect25% 2.71x3.4 smd paste-0.159: 9(0,0)
  silkscreen extent -2.95,-2.5 1.6,2.9, body extent -3.01,-2.45 3.01,2.45, height 1.7
SON-8-3X3 [mm] "SON, 8-Leads, Body 3.00x3.00mm, Pitch 0.65mm, Thermal Pad 2.40x1.60mm, IPC Medium Density"
  oval 0.8x0.3 smd: 1(-1.425,0.975) 2(-1.425,0.325) 3(-1.425,-0.325) 4(-1.425,-0.975) 5(1.425,-0.975) 6(1.425,-0.325) 7(1.425,0.325) 8(1.425,0.975)
  rect 1.6x2.4 smd paste-0.8: 9(0,0)
  silkscreen extent -2.01,-1.61 1.61,1.61, body extent -1.5,-1.5 1.5,1.5, height 1
SOT23-3 [mm] "SOT23, 3-Leads, Body 2.90x1.3mm, Pitch 0.95mm, IPC Medium Density"
  rrect50% 1x0.6 smd: 1(-1.2,0.95) 2(-1.2,-0.95) 3(1.2,0)
  silkscreen extent -1.32,-1.5 0.7,1.92, body extent -1.25,-1.5 1.25,1.5, height 1.1
SOT23-6 [mm] "SOT23, 6-Leads, Body 2.9x1.6mm, Pitch 0.95mm, IPC Medium Density"
  rrect50% 1x0.6 smd: 1(-1.375,0.95) 2(-1.375,0) 3(-1.375,-0.95) 4(1.375,-0.95) 5(1.375,0) 6(1.375,0.95)
  silkscreen extent -1.5,-1.55 0.5,1.93, body extent -1.25,-1.5 1.25,1.5, height 1.1
SOT-5X3-8 [mm] "SOTFL, 8-Leads, Body 2.10x1.60mm, Pitch 0.50mm, IPC Medium Density"
  oval 0.675x0.28 smd: 1(-0.737,0.75) 2(-0.737,0.25) 3(-0.737,-0.25) 4(-0.737,-0.75) 5(0.738,-0.75) 6(0.738,-0.25) 7(0.738,0.25) 8(0.738,0.75)
  silkscreen extent -1.16,-1.16 0.71,1.26, body extent -0.8,-1.05 0.8,1.05, height 0.6
SOT-8015 [mm]
  rect 0.35x0.5 smd paste-0.05 mask+0: 1(0.325,0.5) 2(-0.325,0.5)
  round 0.025 smd paste-0.05 mask+0: 3(0,-0.36)
  silkscreen extent 0.78,0.4 1.02,0.65, body extent -0.55,-0.51 0.55,0.51, height 0.48
SWITCH_SMXS-06K-TP [mm]
  rrect50% 2.2x1.1 smd: 1(-4.4,6.35) 2(-4.4,3.81) 3(-4.4,1.27) 4(-4.4,-1.27) 5(-4.4,-3.81) 6(-4.4,-6.35) 7(4.4,-6.35) 8(4.4,-3.81) 9(4.4,-1.27) 10(4.4,1.27) 11(4.4,3.81) 12(4.4,6.35)
  silkscreen extent -4.52,-7.6 3,7.62, body extent -4.7,-7.62 4.7,7.62, height 4
TACTILE-SWITCH_TS-1088-AR02016 [mm]
  rect 1.05x2 smd: 1(-2.225,0) 2(2.225,0)
  silkscreen extent -2,-1.45 2,1.45, body extent -2.4,-1.45 2.4,1.45, height 2
TESTPOINT_1MM [mm]
  round 1 smd paste-2539.97: 1(0,0)
TESTPOINT_2MM [mm]
  round 2 smd paste-2539.97: 1(0,0)
TESTPOINT_RH-5019 [mm]
  rect 2x3.8 smd: 1(0,0)
  silkscreen extent -1.22,-2.12 1.23,2.12, body extent -1.01,-1.91 1.01,1.91, height 2.29
TSSOP-16-EP-4.4 [mm] "TSSOP, 16-Leads, Body 5.00x4.40mm, Pitch 0.65mm, Thermal Pad 3.30x3.30mm, IPC Medium Density"
  oval 1.475x0.4 smd: 1(-2.913,2.275) 2(-2.913,1.625) 3(-2.913,0.975) 4(-2.913,0.325) 5(-2.913,-0.325) 6(-2.913,-0.975) 7(-2.913,-1.625) 8(-2.913,-2.275) 9(2.912,-2.275) 10(2.912,-1.625) 11(2.912,-0.975) 12(2.912,-0.325) 13(2.912,0.325) 14(2.912,0.975) 15(2.912,1.625) 16(2.912,2.275)
  rect 3.3x3.3 smd paste-1.65: 17(0,0)
  silkscreen extent -3.59,-2.61 1.85,2.89, body extent -3.2,-2.5 3.2,2.5, height 1.13
WSON-6-2X2 [mm] "SON, 6-Leads, Body 2.00x2.00mm, Pitch 0.65mm, Thermal Pad 1.60x0.95mm, IPC Medium Density"
  oval 0.65x0.3 smd: 1(-1.02,0.65) 2(-1.02,0) 3(-1.02,-0.65) 4(1.02,-0.65) 5(1.02,0) 6(1.02,0.65)
  rect 0.95x1.6 smd paste-2539.97: EP(0,0)
  silkscreen extent -1.51,-1.11 1.11,1.19, body extent -1,-1 1,1, height 0.8

## Part data
C1 C2 C5 C6 C40 C41: library part CAPACITOR_CL05C100JB5NNNC, "Capacitor - 10pF - 50V - 0402 - C0G", Manufacturer 1=Samsung, Supplier Part Number 1=C32949, Voltage=50V, Manufacturer Part Number 1=CL05C100JB5NNNC, Supplier 1=LCSC
C3 C4 C21 C29 C35 C36 C42 C62 C64 C65 C68 C69: library part CAPACITOR_CL10A225KO8NNNC, "Capacitor - 2.2uF - 16V - 0603 - X5R", Manufacturer 1=Samsung, Supplier Part Number 1=C23630, Voltage=16V, Manufacturer Part Number 1=CL10A225KO8NNNC, Supplier 1=LCSC
C7 C8 C9 C10 C11 C12 C13 C14 C15 C16 C17 C18 C19 C20 C22 C23 C24 C25 C26 C30 C33 C37 C38 C39 C43 C44 C45 C46 C47 C48 C54 C60 C61: library part CAPACITOR_CL05B104KB54PNC, "Capacitor - 100nF - 50V - 0402 - X7R", Manufacturer 1=Samsung, Supplier Part Number 1=C307331, Voltage=50V, Manufacturer Part Number 1=CL05B104KB54PNC, Supplier 1=LCSC
C27 C31 C32 C56 C57 C58 C63 C66 C67: library part CAPACITOR_CL31A226KAHNNNE, "Capacitor - 22uF - 25V - 1206", Manufacturer 1=Samsung, Supplier Part Number 1=C12891, Voltage=25V, Manufacturer Part Number 1=CL31A226KAHNNNE, Supplier 1=LCSC
C28 C34 C55: library part CAPACITOR_CL05A105KA5NQNC, "Capacitor - 1uF - 25V - 0402 - X5R", Manufacturer 1=Samsung, Supplier Part Number 1=C52923, Voltage=25V, Manufacturer Part Number 1=CL05A105KA5NQNC, Supplier 1=LCSC
C49 C50: library part CAPACITOR_EMLA500ARA470MF80G, "Capacitor - 47uF - 50V", Manufacturer 1="NCC(Nippon Chemi-Con)", Supplier Part Number 1=C2972709, Voltage=50V, Manufactuerer Part Number 1=EMLA500ARA470MF80G, Supplier 1=LCSC
C51 C52 C53 C59: library part CAPACITOR_CC1206KKX7R0BB225, "Capacitor - 2.2uF - 100V - 1206 - X7R", Manufacturer 1=YAGEO, Supplier Part Number 1=C577211, Voltage=100V, Manufacturer Part Number 1=CC1206KKX7R0BB225, Supplier 1=LCSC
D1 D2 D5 D8 D9: library part LED_KT-0603R, "LED - Red - 0603", Manufacturer 1="Hubei KENTO Elec", Supplier Part Number 1=C2286, Manufacturer Part Number 1=KT-0603R, Supplier 1=LCSC
D3 D6: library part DIODE_TVS_UNIDIRECTIONAL_5-7-9.2V_SMF5.0A, "TVS Diode 5V standoff, 7V breakdown, 9.2V clamp", Manufacturer 1=Littelfuse, Supplier Part Number 1=C151296, Manufacturer Part Number 1=SMF5.0A, Supplier 1=LCSC
D4 D7: library part ESD-ARRAY_4-Channel_TPD4E1U06DBVR-TP, "Diode - TVS - USB ESD Protection - SOT23-6", Manufacturer 1="Tech Public", Supplier Part Number 1=C2841427, Manufacturer Part Number 1=TPD4E1U06DBVR-TP, Supplier 1=LCSC
D10: library part DIODE_TVS_BIDIRECTIONAL_36-46-58.1_SMBJ36CA-13-F, "TVS Diode 36V standoff, 46V breakdown, 58.1V clamp", Manufacturer 1="Diodes Inc.", Supplier Part Number 1=C135071, Manufacturer Part Number 1=SMBJ36CA-13-F, Supplier 1=LCSC
D11: library part ESD-ARRAY_2-Channel_PESD2CANFD36VQB-QZ, "36V standoff ESD array", Manufacturer 1=Nexperia, Supplier Part Number 1=C25652470, Manufacturer Part Number 1=PESD2CANFD36VQB-QZ, Supplier 1=LCSC
F1: library part FUSE_R12.000.8, "8A 1206 Fuse", Manufacturer 1=Reomax, Supplier Part Number 1=C5383193, Manufacturer Part Number 1=R12.000.8, Supplier 1=LCSC
J1 J2 J3 J4 J5 J8 J9 J10: library part CONNECTOR_Female-header_1x10_2.54mm_PM254-1-10-Z-8.5_NOSILK, "Header - 1x10 - 2.54mm", Manufacturer 1=HCTL, Supplier Part Number 1=C2897373, Manufacturer Part Number 1=PM254-1-10-Z-8.5, Supplier 1=LCSC
J6 J7: library part CONNECTOR_HC-1.0-6PLT, Manufacturer 1=HCTL, Manufacturer Part Number 1=HC-1.0-6PLT, Supplier Part Number 1=C2845374, Supplier 1=LCSC
J11 J12: library part CONNECTOR_HC-1.0-4PLT, Manufacturer 1=HCTL, Manufacturer Part Number 1=HC-1.0-4PLT, Supplier Part Number 1=C2845372, Supplier 1=LCSC
J13 J14: library part CONNECTOR_HC-1.0-5PLT, Manufacturer 1=HCTL, Manufacturer Part Number 1=HC-1.0-5PLT, Supplier Part Number 1=C2845373, Supplier 1=LCSC
J15 J16: library part CONNECTOR_PM254-1-15-Z-8.5, "1x15 2.54mm Female Header", Manufacturer 1=HCTL, Supplier Part Number 1=C2897378, Manufacturer Part Number 1=PM254-1-15-Z-8.5, Supplier 1=LCSC
J17: library part CONNECTOR_MICRO-SD_DM3AT-SF-PEJM5, "Micro SD Card scoket", Manufacturer 1=Hirose, Supplier Part Number 1=C114218, Manufacturer Part Number 1=DM3AT-SF-PEJM5, Supplier 1=LCSC
J18 J19: library part CONNECTOR_USBC_TYPE-C-31-M-12, "USB Recepticle - Type-C", Manufacturer 1="Korean Hroparts Elec", Supplier Part Number 1=C165948, Manufacturer Part Number 1=TYPE-C-31-M-12, Supplier 1=LCSC
J20: library part CONNECTOR_2.54mm-1x5-unpopulated, "Connector - 2.54mm - 1x5 - unpopulated"
J21 J22: library part CONNECTOR_WJ15EDGRC-3.81-05P-14-00A, "5 pin terminal block", Manufacturer 1="Ningbo Kangnex Elec", Supplier Part Number 1=C8395, Manufacturer Part Number 1=WJ15EDGRC-3.81-05P-14-00A, Supplier 1=LCSC
L1: library part INDUCTOR_ASPI-0630LR-150M-T15, "Power inductor - 15uH - Shielded", Manufacturer 1="Abracon LLC", Supplier Part Number 1=C5122440, Manufacturer Part Number 1=ASPI-0630LR-150M-T15, Supplier 1=LCSC
Q1 Q3: "N Channel Mosfet - 26.5mΩ - SOT23-3", Manufacturer 1=AOS, Supplier Part Number 1=C20917, Manufacturer Part Number 1=AO3400A, Supplier 1=LCSC, Supplier 2=DigiKey, Supplier Part Number 2=785-1000-1-ND
Q2: library part TRANSISTOR_NPN-BJT_MMBT3904, "NPN Transistor", Manufacturer 1="Jiangsu Changjing Electronics Technology Co., Ltd.", Supplier Part Number 1=C20526, Manufacturer Part Number 1=MMBT3904, Supplier 1=LCSC
R1 R8 R21 R22 R23 R24 R25 R26 R28 R32 R33 R35 R40 R45 R46 R48 R49 R50 R61 R62: library part RESISTOR_0402WGF1502TCE, "Resistor - 15k - 0402", Manufacturer 1=UNI-ROYAL, Supplier Part Number 1=C25756, Voltage=50V, Manufacturer Part Number 1=0402WGF1502TCE, Supplier 1=LCSC, Wattage=62.5mW
R2 R3 R4 R5 R6 R7 R20 R27 R44 R47 R51 R53 R54 R57: library part RESISTOR_0402WGF2003TCE, "Resistor - 200k - 0402", Manufacturer 1=UNI-ROYAL, Supplier Part Number 1=C25764, Voltage=50V, Manufacturer Part Number 1=0402WGF2003TCE, Supplier 1=LCSC, Wattage=62.5mW
R9 R10 R31 R37 R38 R39 R63 R64: library part RESISTOR_0402WGF5101TCE, "Resistor - 5.1k - 0402", Manufacturer 1=UNI-ROYAL, Supplier Part Number 1=C25905, Voltage=50V, Manufacturer Part Number 1=0402WGF5101TCE, Supplier 1=LCSC, Wattage=62.5mW
R11 R14 R15 R16 R17 R41 R42 R43 R52 R58: library part RESISTOR_0402WGF1501TCE, "Resistor - 1.5k - 0402", Manufacturer 1=UNI-ROYAL, Supplier Part Number 1=C25867, Voltage=50V, Manufacturer Part Number 1=0402WGF1501TCE, Supplier 1=LCSC, Wattage=62.5mW
R12 R13 R56 R60: library part RESISTOR_RC0402FR-076K04L, "Resistor - 6.04k - 0402", Manufacturer 1=Yageo, Supplier Part Number 1=C97819, Voltage=50V, Manufacturer Part Number 1=RC0402FR-076K04L, Supplier 1=LCSC, Wattage=62.5mW
R18 R19: library part RESISTOR_0402WGF330JTCE, "Resistor - 33 -0402", Manufacturer 1="UNI-ROYAL(Uniroyal Elec)", Supplier Part Number 1=C25105, Voltage=50V, Manufacturer Part Number 1=0402WGF330JTCE, Supplier 1=LCSC, Wattage=62.5mW
R29 R55: library part RESISTOR_0402WGF1004TCE, "Resistor - 1M - 0402", Manufacturer 1=UNI-ROYAL, Supplier Part Number 1=C26083, Voltage=50V, Manufacturer Part Number 1=0402WGF1004TCE, Supplier 1=LCSC, Wattage=62.5mW
R30 R36: library part RESISTOR_0603WAF100KT5E, "Resistor - 1 - 0603", Manufacturer 1=UNI-ROYAL, Supplier Part Number 1=C22936, Voltage=75V, Manufacturer Part Number 1=0603WAF100KT5E, Supplier 1=LCSC, Wattage=100mW
R34 R59: library part RESISTOR_0402WGF3302TCE, "Resistor - 33k - 0402", Manufactuer 1=UNI-ROYAL, Supplier Part Number 1=C25779, Voltage=50V, Manufactuer Part Number 1=0402WGF3302TCE, Supplier 1=LCSC, Wattage=62.5mW
SW1: library part SWITCH_SMXS-06K-TP, "6 bit DIP switch", Manufacturer 1="SM Switch", Supplier Part Number 1=C5439765, Manufacturer Part Number 1=SMXS-06K-TP, Supplier 1=LCSC
SW2 SW3: library part SWITCH_Tactile_TS-1088-AR02016, "Push button", Manufacturer 1=XUNPU, Supplier Part Number 1=C720477, Manufacturer Part Number 1=TS-1088-AR02016, Supplier 1=LCSC
TP1: library part TESTPOINT_1mm, "TestPoint 1mm"
TP2 TP3 TP4 TP5 TP6 TP7 TP8 TP9 TP10 TP11 TP12 TP13 TP14 TP15 TP16 TP17 TP18 TP19 TP20 TP21 TP22 TP23 TP24 TP25 TP26 TP27 TP30 TP31: library part TESTPOINT_RH-5019, "SMD testpoint", Manufacturer 1=ronghe, Supplier Part Number 1=C5199800, Manufacturer Part Number 1=RH-5019, Supplier 1=LCSC
TP28 TP29: library part TESTPOINT_2mm, "TestPoint 2mm"
U1: "Arm Cortex-M33 MCU - 512KB Flash - 272KB SRAM - 250 MHz - LQFP144", Manufacturer 1=ST, Manufacturer Part Number 1=STM32H523ZET6, Supplier Part Number 1=511-STM32H523ZET6, Supplier 1=Mouser
U2: library part INTERFACE_USBC-Port-Controller_TUSB320, "USBC power port controller", Manufacturer 1="Texas Instruments", Manufacturer Part Number 1=TUSB320LAIRWBR, Supplier Part Number 1=C132554, Supplier 1=LCSC
U3: library part "POWER-SWITCH_ AP22652", "Active low USB power switch", Manufacturer 1="Diodes Inc.", Manufacturer Part Number 1=AP22652W6-7, Supplier Part Number 1=C2158038, Supplier 1=LCSC
U4: library part TRANSCEIVER_TCAN1044V, "CAN Tranceiver", Manufacturer 1="Texas Instruments", Supplier Part Number 1=C5215851, Manufacturer Part Number 1=TCAN1044VDRBRQ1, Supplier 1=LCSC
U5: library part MCU_STM32F103CBT6, "Arm Cortex-M3 MCU - 128KB Flash - 20KB SRAM - 72 MHz - LQFP48", Manufacturer 1=STMicroelectronics, Supplier Part Number 1=C8304, Manufacturer Part Number 1=STM32F103CBT6, Supplier 1=LCSC
U6: library part EFUSE_TPS2660x, "150mΩ efuse - reverse blocking", Manufacturer 1="Texas Instruments", Supplier Part Number 1=C544399, Manufacturer Part Number 1=TPS26600PWPR, Supplier 1=LCSC
U7: library part REGULATOR_BUCK_LMR36520, "2A syncronous buck converter", Manufacturer 1="Texas Instruments", Supplier Part Number 1=C2879422, Manufacturer Part Number 1=LMR36520ADDAR, Supplier 1=LCSC
U8 U11: library part REGULATOR_Linear_3.3V_TLV76733DRVR, "LDO - 16V input - 3.3V output - 1A", Manufacturer 1="Texas Instruments", Supplier Part Number 1=C2848334, Manufacturer Part Number 1=TLV76733DRVR, Supplier 1=LCSC
U9 U10: library part POWER-MUX_2-Channel_TPS2116, "Priority power mux - 2 Channel", Manufacturer 1="Texas Instruments", Manufacturer Part Number 1=TPS2116DRLR, Supplier Part Number 1=C3235557, Supplier 1=LCSC
X1 X3: library part CRYSTAL_NX3225GD-8MHZ-STD-CRA-3, "8Mhz crystal 3225-2P", Manufacturer 1=NDK, Supplier Part Number 1=C889706, Manufacturer Part Number 1=NX3225GD-8MHZ-STD-CRA-3, Supplier 1=LCSC
X2: library part "CRYSTAL_FC-135 32.7680KA-AG3", "32.768kHz crystal 3215-2P", Manufacturer 1="Seiko Epson", Supplier Part Number 1=C7275970, Manufacturer Part Number 1="FC-135 32.7680KA-AG3", Supplier 1=LCSC

## Free pads (board coordinates)
  round 5 hole 3.2: 10(-59,-31.725) 10(-59,31.75) 10(59,-31.75) 10(59,31.75)

## Via types
v1: diameter 0.45, hole 0.3, L1 to L4, tented both sides, 298 vias
v2: diameter 0.6, hole 0.3, L1 to L4, tented both sides, 127 vias
v3: diameter 1.25, hole 1, L1 to L4, 39 vias
v4: diameter 0.6, hole 0.3, L1 to L4, 15 vias
v5: diameter 0.5, hole 0.3, L1 to L4, 8 vias